# Altium PCB PCB-Powermodule-v11.0.0.PcbDoc (part 1 of 5)
Units mil, origin at the board's own origin, x right, y up, seen from the top; angles counter-clockwise.
Board outline 3031.5 x 1495.87 mil, 4 copper layers (Top Layer, Ground, Power, Bottom Layer), stack 61.653 mil thick; 227 components, 160 nets, 893 pads, 326 vias.
Unrouted connection lines stored in the file: 45.
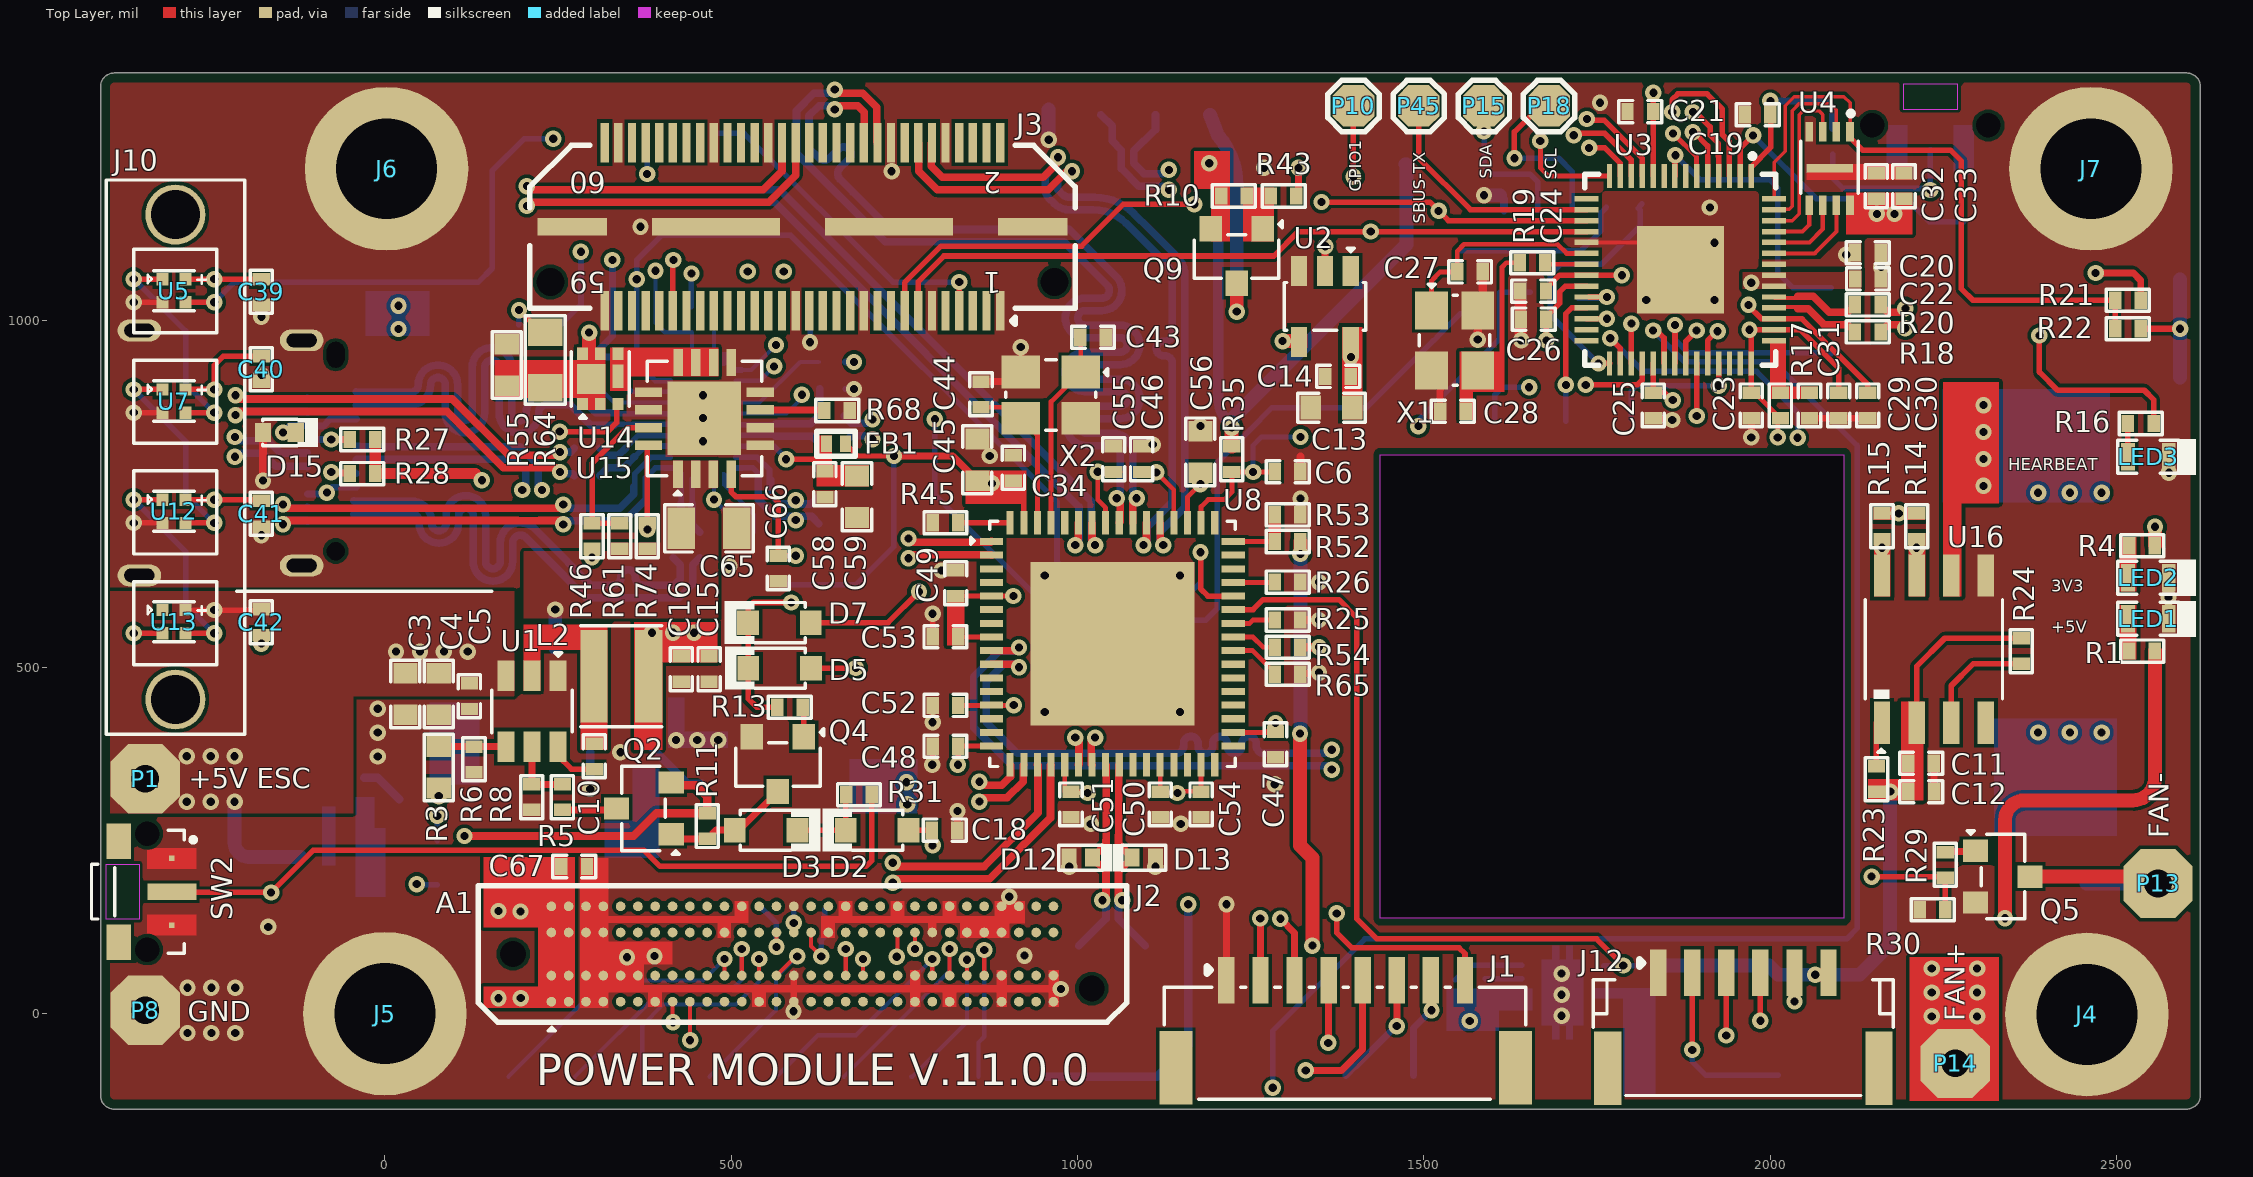
[diagram p0: Top Layer view]
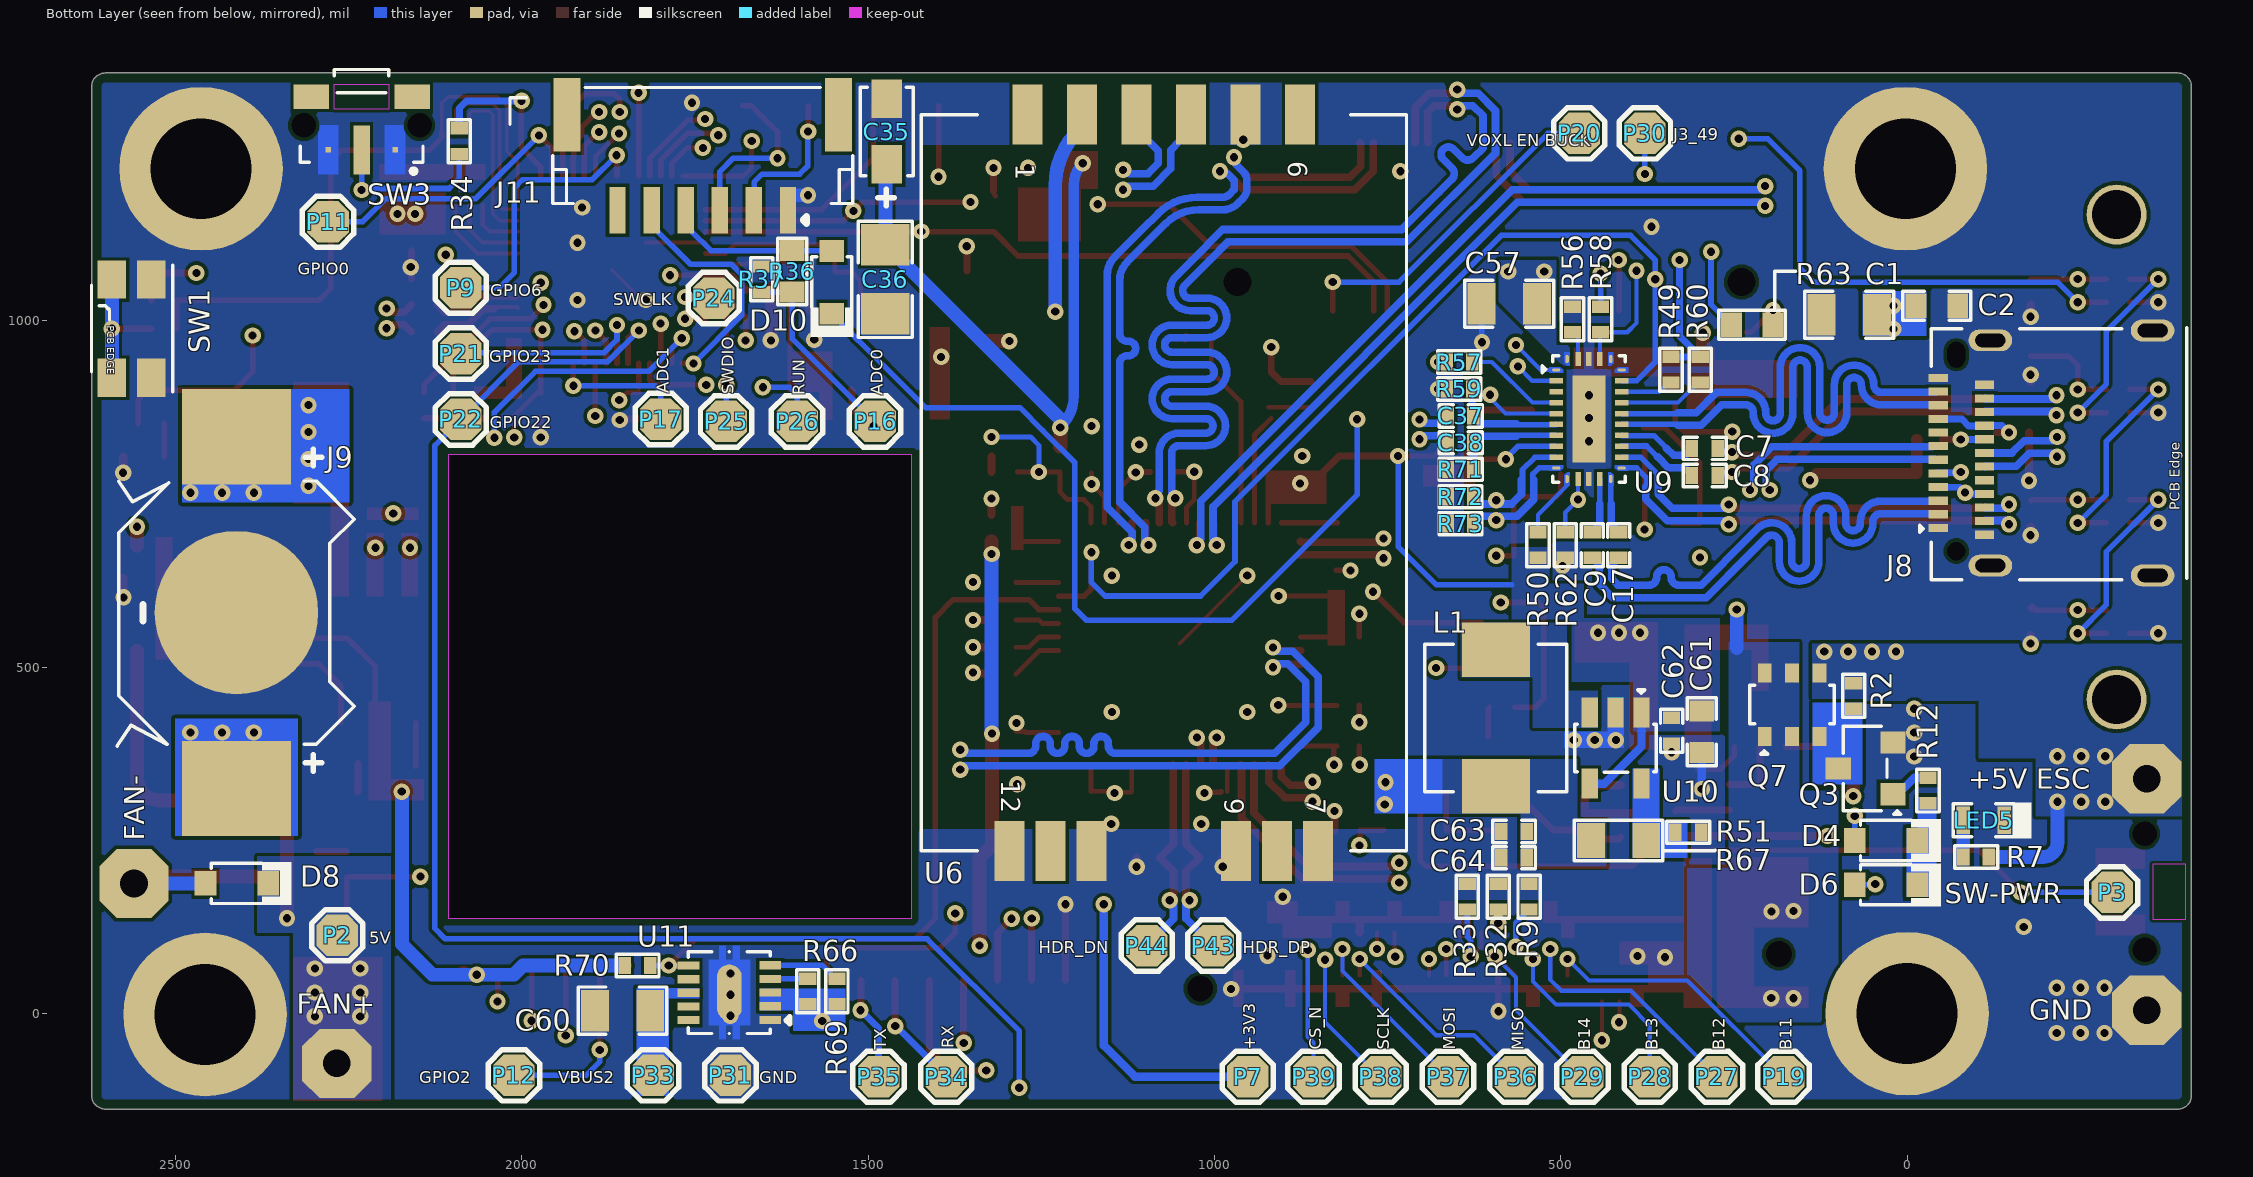
[diagram p1: Bottom Layer view, seen from below]
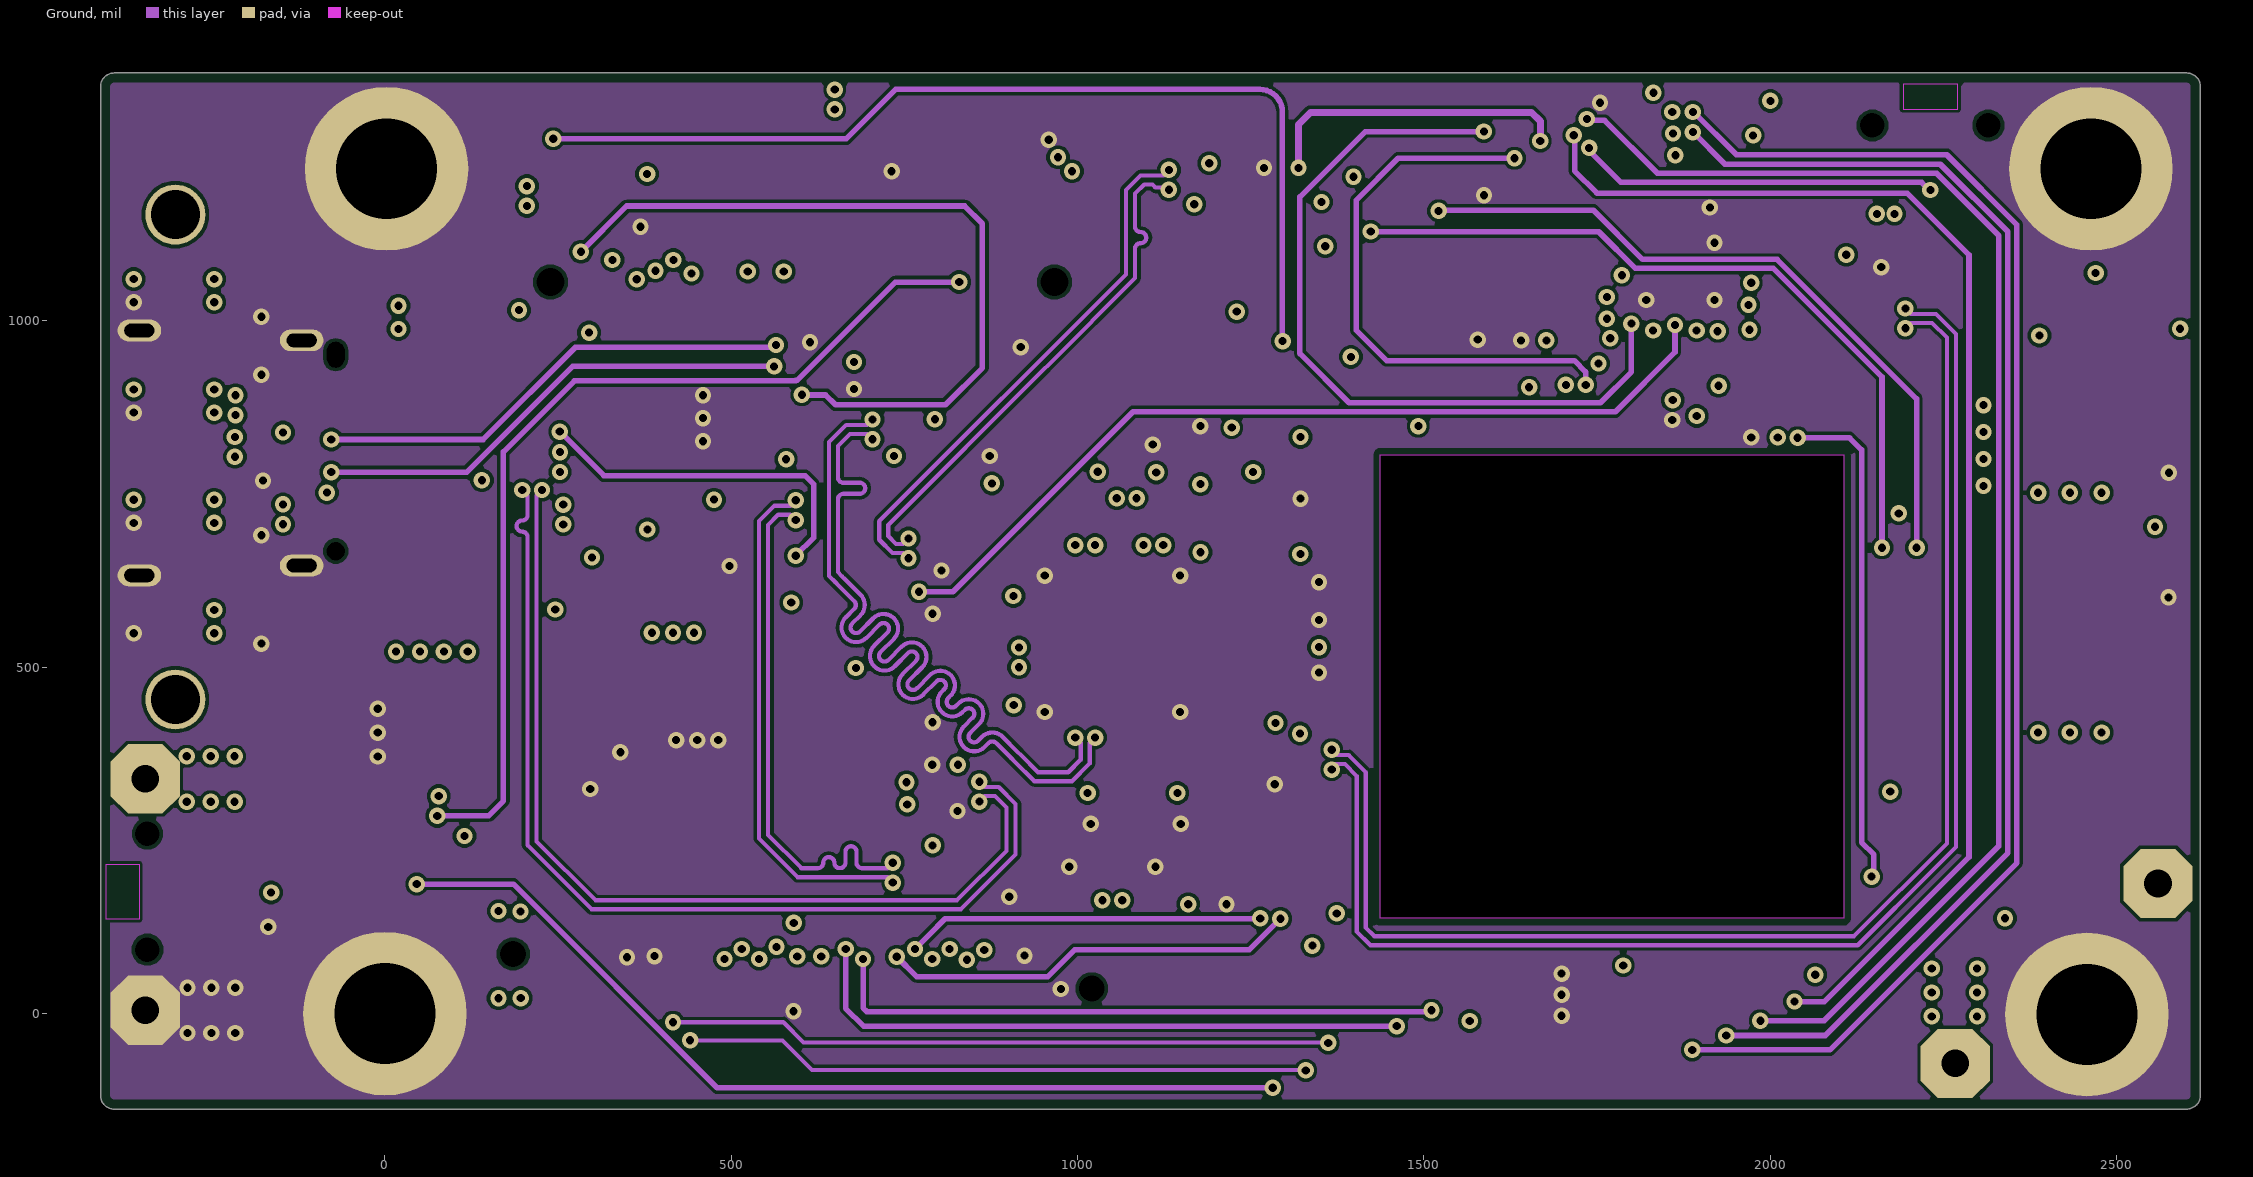
[diagram p2: Ground]
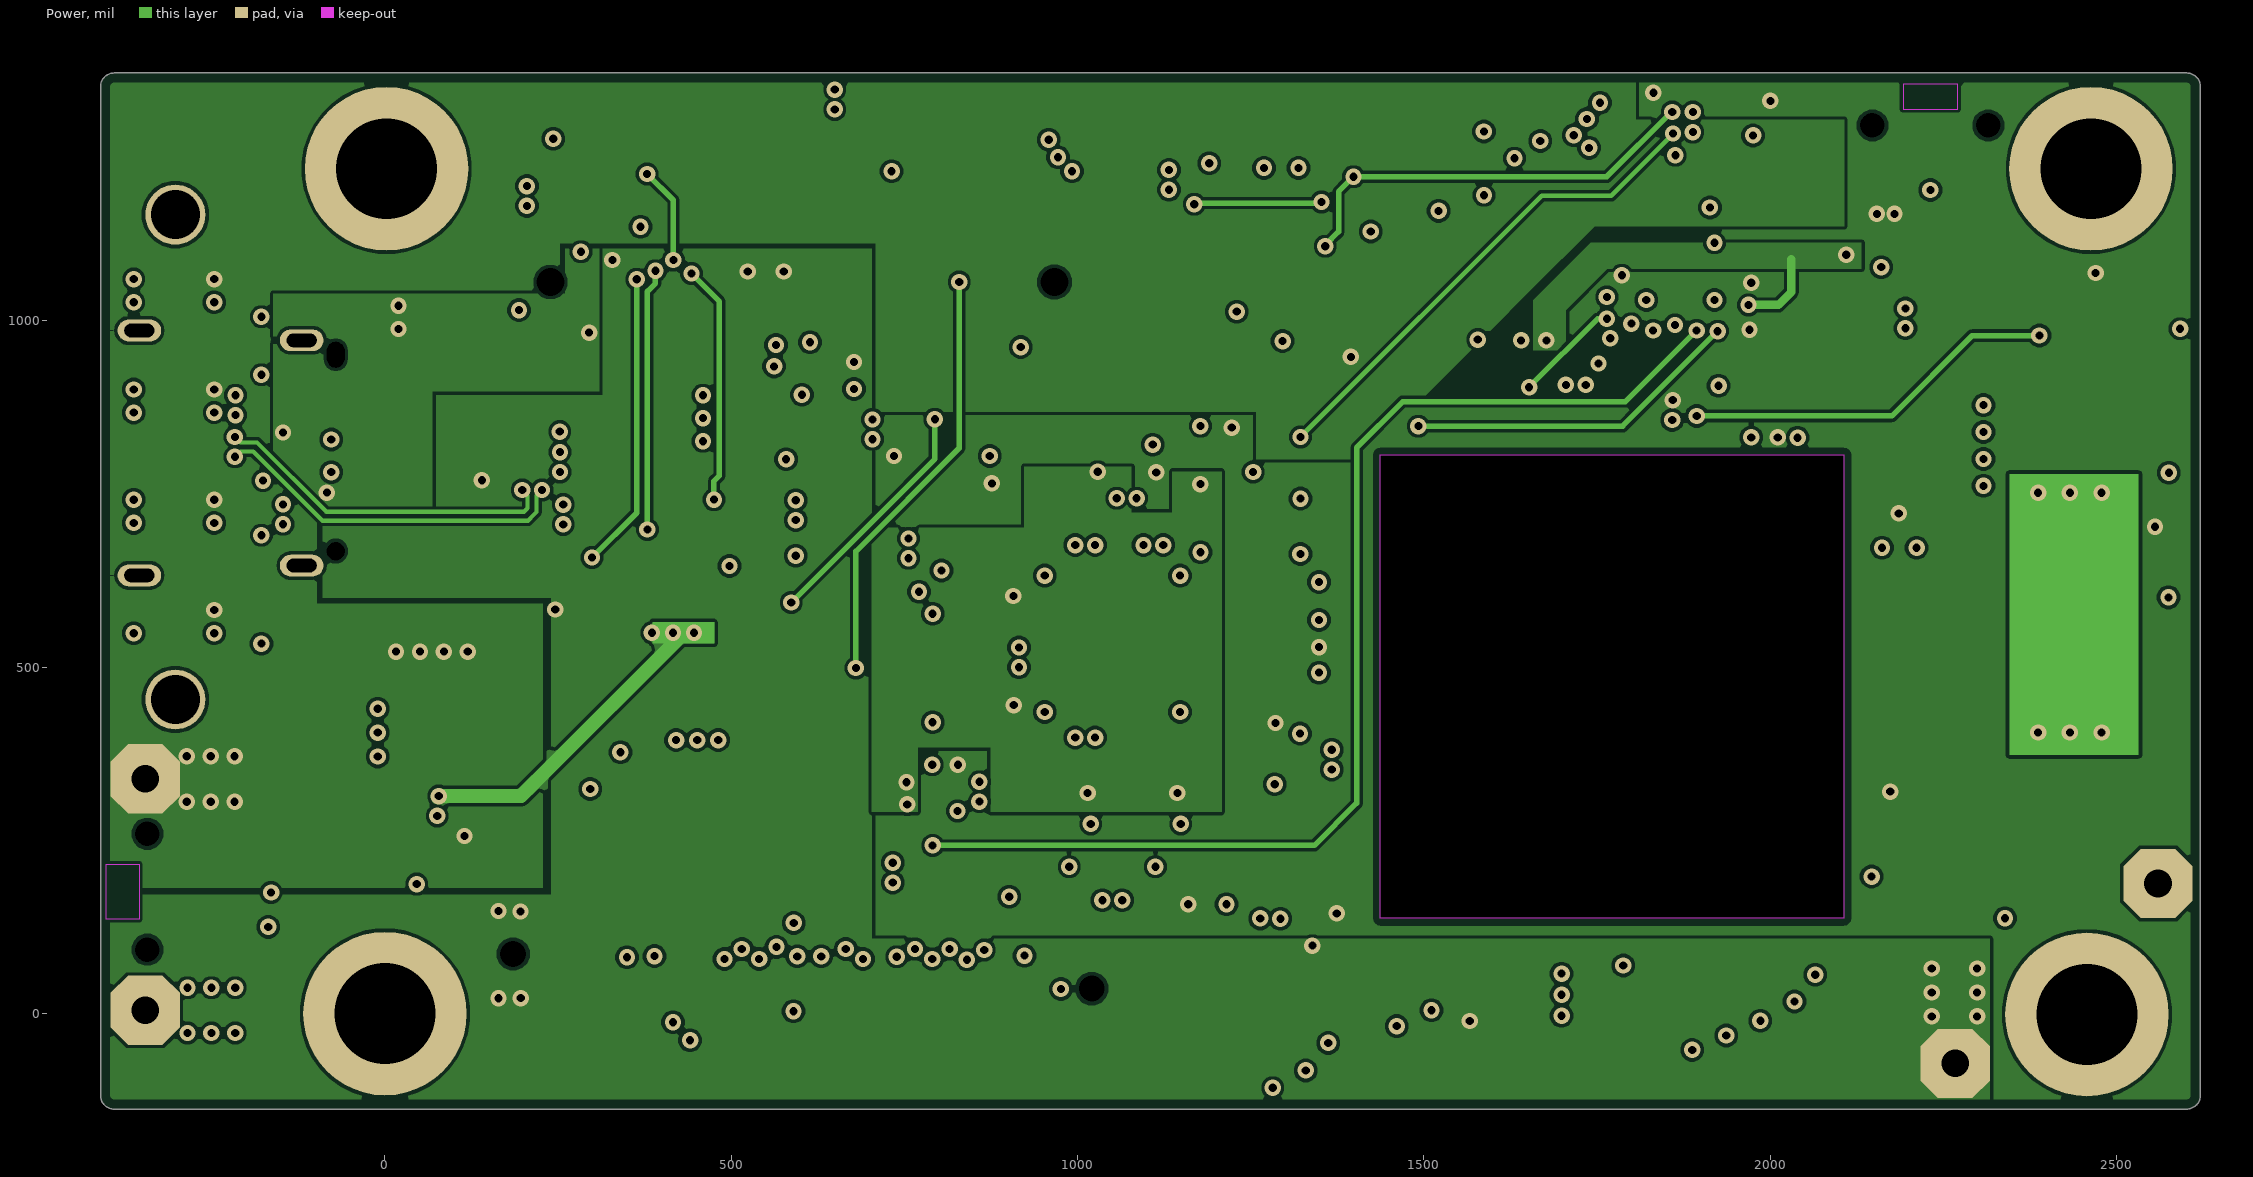
[diagram p3: Power]
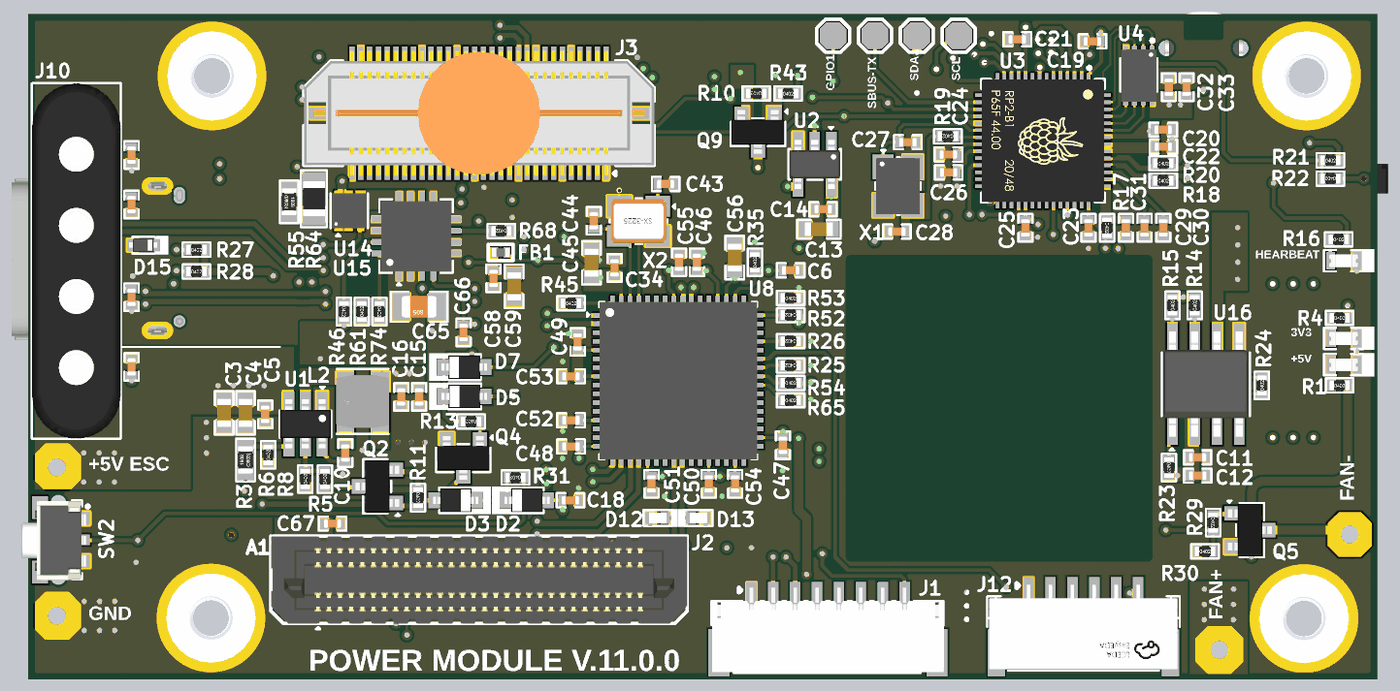
[diagram p6: 3D render of the assembled board from above, using the file's embedded part models]
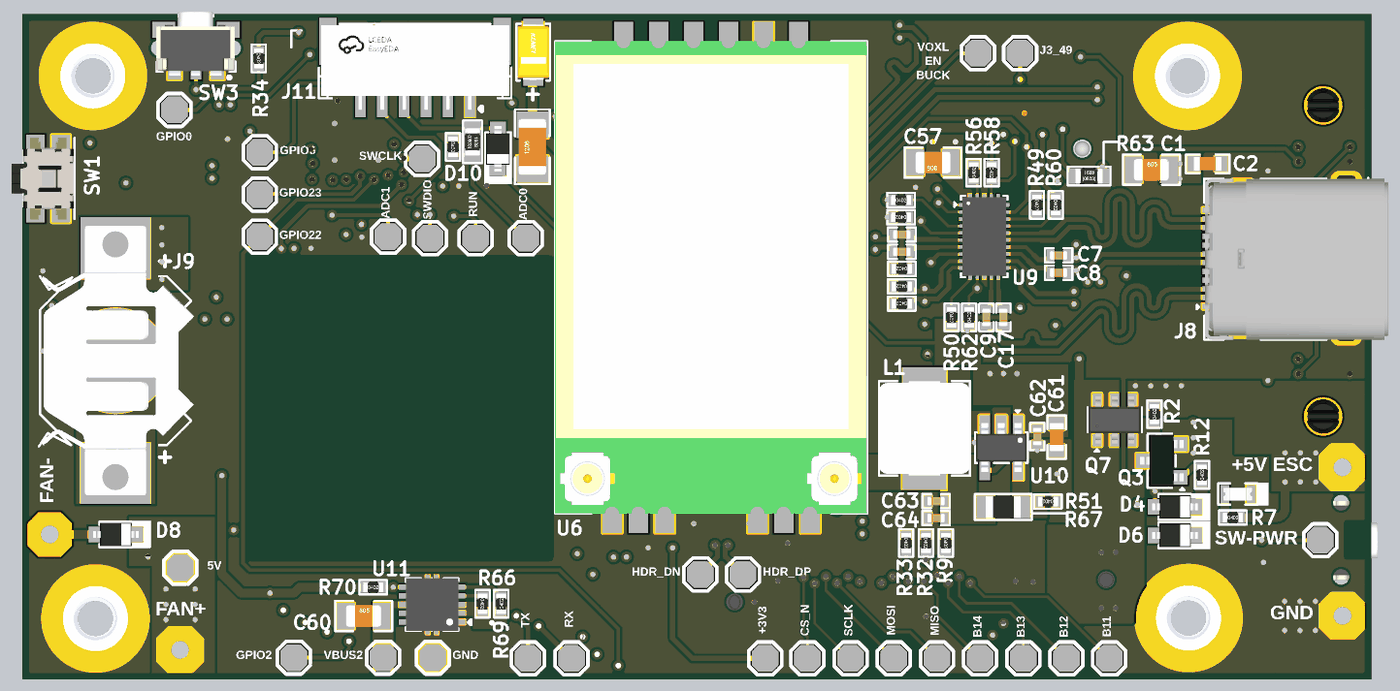
[diagram p7: 3D render of the assembled board from below, using the file's embedded part models]

## Layer stack, top to bottom
Top Solder: solder mask 0.787, SM-001, Dk 4
Top Layer: signal copper 1.378
Dielectric 1: prepreg 7.992, PP-017, Dk 4.3
Ground: signal copper 1.181
Dielectric 3: core 40.551, Core-039, Dk 4.8
Power: signal copper 1.181
Dielectric 5: prepreg 7.992, PP-017, Dk 4.3
Bottom Layer: signal copper 1.378
Bottom Solder: solder mask 0.787, SM-001, Dk 4

## Board outline
-410.5,-118.11 -410.5,1338.39 cw(c-390.81,1338.39) -390.81,1358.07 2601,1358.07 2601.32,1358.07 cw(c2601.32,1338.39) 2621,1338.39 2621,-118.31 2621,-118.11 cw(c2601.32,-118.11) 2601.32,-137.8 -390.81,-137.79 cw(c-390.81,-118.11)
cut-out: 1437.21,137.4 1437.21,806.69 2106.5,806.69 2106.5,137.4

## Design rules (kind name [scope] priority, off if disabled: settings)
BoardOutlineClearance [All] p1: gap=0 ignorepadtopadclearanceinfootprint=FALSE except(10: Poly-CavityEdge Poly-CutoutEdge Poly-SplitBarrior; 14: Poly-OutlineEdge)
Clearance [All] p1: gap=5 ignorepadtopadclearanceinfootprint=FALSE
DiffPairsRouting [InDifferentialPairClass('All Differential Pairs')] p1: maxlimit=7 minlimit=7 mostfreqgap=7 toplayer_minwidth=6 toplayer_maxwidth=11 toplayer_prefwidth=11 midlayer1_minwidth=6 midlayer1_maxwidth=6 midlayer1_prefwidth=6 midlayer2_minwidth=6 midlayer2_maxwidth=6 midlayer2_prefwidth=6 bottomlayer_minwidth=6 bottomlayer_maxwidth=11 bottomlayer_prefwidth=11 impedanceprofiledriven=TRUE impedanceprofileid={9FB91FCD-7C47-4A22-8230-657BD11F0473} impedanceprofilevalue=90.000000 maxuncoupledlength=500
Height [All] p1: minheight=0 maxheight=39370.08 prefheight=0
HoleSize [All] p1: absolutevalues=TRUE maxlimit=1000 minlimit=1 maxpercent=80.000 minpercent=20.000
HoleToHoleClearance [All] p1: gap=6 allowstackedmicrovias=TRUE
MatchedLengths "Schematic Matched Net Lengths_2" [InNetClass('VOXL_SS_USB')] p1: tolerance=20 checknetsindiffpair=TRUE checkdiffpairvsdiffpair=FALSE checkxsignals=FALSE checkothers=FALSE
MatchedLengths "Schematic Matched Net Lengths_1" [InNetClass('D_SS')] p2: tolerance=20 checknetsindiffpair=TRUE checkdiffpairvsdiffpair=FALSE checkxsignals=FALSE checkothers=FALSE
MatchedLengths "Schematic Matched Net Lengths" [InNetClass('VOXL_USB')] p3: tolerance=20 checknetsindiffpair=TRUE checkdiffpairvsdiffpair=FALSE checkxsignals=FALSE checkothers=FALSE
MatchedLengths "Schematic Matched Net Lengths_5" [InNetClass('D')] p4: tolerance=20 checknetsindiffpair=TRUE checkdiffpairvsdiffpair=FALSE checkxsignals=FALSE checkothers=FALSE
MatchedLengths "Schematic Matched Net Lengths_3" [InNetClass('USB_D')] p5: tolerance=20 checknetsindiffpair=TRUE checkdiffpairvsdiffpair=FALSE checkxsignals=FALSE checkothers=FALSE
MaxMinImpedance "Schematic Impedance Constraint_3" [InNetClass('VOXL_SS_USB')] p1: minimum=88.00 maximum=102.0
MaxMinImpedance "Schematic Impedance Constraint_2" [InNetClass('VOXL_USB')] p2: minimum=88.00 maximum=102.0
MaxMinImpedance "Schematic Impedance Constraint" [InNetClass('D_SS')] p3: minimum=88.00 maximum=102.0
MaxMinImpedance "Schematic Impedance Constraint_4" [InNetClass('D')] p4: minimum=88.00 maximum=102.0
MaxMinImpedance "Schematic Impedance Constraint_1" [InNetClass('USB_D')] p5: minimum=88.00 maximum=102.0
MinimumSolderMaskSliver [All] p1: minsoldermaskwidth=0
PolygonConnect [All] p1: connectstyle=Direct reliefconductorwidth=10 reliefentries=4 polygonreliefangle="90 Angle" airgapwidth=10
RoutingVias [All] p1: holewidth=11.81 width=23.62 viastyle="Through Hole" minholewidth=11.81 minwidth=23.62 maxholewidth=11.81 maxwidth=23.62
SilkToSilkClearance [All] p1: silktosilkclearance=0
SilkToSolderMaskClearance [IsPad] p1: minsilkscreentomaskgap=0 clearancetoexposedcopper=TRUE
SolderMaskExpansion SolderMaskExpansion_1 [IsVia] p1: expansion=4 istentingtop=TRUE
SolderMaskExpansion [All] p2: expansion=4 istentingtop=FALSE
SupplyNets "Schematic Supply Nets_6" [InNet('+1V1')] p1: voltage=0.000
SupplyNets "Schematic Supply Nets_5" [InNet('1V1')] p2: voltage=0.000
SupplyNets "Schematic Supply Nets_4" [InNet('GND')] p3: voltage=0.000
SupplyNets "Schematic Supply Nets_3" [InNet('+5V_ESC')] p4: voltage=0.000
SupplyNets "Schematic Supply Nets_2" [InNet('VOXL_EN_BUCK')] p5: voltage=0.000
SupplyNets "Schematic Supply Nets_1" [InNet('+5V')] p6: voltage=0.000
SupplyNets "Schematic Supply Nets" [InNet('+3V3')] p7: voltage=0.000
UnRoutedNet [All] p1: checkbadconnections=TRUE
Width [All] p1: maxlimit=100 minlimit=5 preferedwidth=5
22 further rules are at their usual default settings.

## Classes and differential pairs
differential pair class VOXL_USB_Lines: VOXL_USB
differential pair class D_SS_Lines: USB3_RX0 USB3_TX0
net class VOXL_USB: VOXL_USB_N VOXL_USB_P
net class D_SS: USB3_RX0_N USB3_RX0_P USB3_TX0_N USB3_TX0_P
differential pair class USB_LINES: USBC_D
differential pair class DP_LINES: CRX1 CRX2 CTX1 CTX1C CTX2 CTX2C USB3_RX0C
component class "USB HUB_Section": C1 C2 C6 C7 C8 C9 C17 C34 C37 C38 C43 C44 C45 C46 C47 C48 C49 C50 C51 C52 C53 C54 C55 C56 C57 C58 C59 C60 C61 C62 C63 C64 C65 C66 D12 D13 D15 FB1 J8 L1 P31 P33 P43 P44 R25 R26 R27 R28 R35 R45 R46 R49 R50 R51 R52 R53 R54 R55 R56 R57 R58 R59 R60 R61 R62 R63 R64 R65 R66 R67 R68 R69 R70 R71 R72 R73 R74 U8 U9 U10 U11 U14 U15 X2
component class RTC_Section: C11 C12 J9 R14 R15 R23 R24 U16
differential pair class VOXL_SS_USB_Lines: VOXL_USB_SSRX VOXL_USB_SSTX
differential pair class USB_WIFI_Lines: USB-WIFI
differential pair class USB_D_Lines: USB_D
differential pair class D_Lines: D USB-WIFI USB_HDR_D USBC_D
net class VOXL_SS_USB: VOXL_USB_SSRX_N VOXL_USB_SSRX_P VOXL_USB_SSTX_N VOXL_USB_SSTX_P
net class USB_D: USB_D_N USB_D_P
net class USB-WIFI: USB-WIFI_N USB-WIFI_P
net class D: D_N D_P USB-WIFI_N USB-WIFI_P USB_HDR_D_N USB_HDR_D_P USBC_D_N USBC_D_P
component class WiFiModule_Section: C35 C36 Q9 R10 R43 U6
component class Power_Section: C3 C4 C5 C10 C13 C14 C15 C16 C18 C39 C40 C41 C42 D2 D3 D4 D5 D6 D7 D8 D10 J10 L2 LED1 LED2 LED5 P1 P2 P3 P7 P8 P13 P14 P20 P21 P22 Q2 Q3 Q4 Q5 Q7 R1 R2 R3 R4 R5 R6 R7 R8 R11 R12 R13 R29 R30 R31 R34 R36 R37 SW2 SW3 U1 U2 U5 U7 U12 U13
component class FlashMemory_Section: C32 C33 R21 R22 SW1 U4
component class Controller_Section: C19 C20 C21 C22 C23 C24 C25 C26 C27 C28 C29 C30 C31 LED3 P9 P10 P11 P12 P15 P16 P17 P18 P24 P25 P26 R16 R17 R18 R19 R20 U3 X1
component class Connector_Section: C67 J1 J2 J3 J4 J5 J6 J7 J11 J12 P19 P27 P28 P29 P30 P34 P35 P36 P37 P38 P39 P45 R9 R32 R33
differential pair USB_HDR_D: +USB_HDR_D_P -USB_HDR_D_N
differential pair USB3_RX0C: +USB3_RX0C_P -USB3_RX0C_N
differential pair CTX2C: +CTX2C_P -CTX2C_N
differential pair CTX1C: +CTX1C_P -CTX1C_N
differential pair VOXL_USB_SSTX: +VOXL_USB_SSTX_P -VOXL_USB_SSTX_N
differential pair VOXL_USB_SSRX: +VOXL_USB_SSRX_P -VOXL_USB_SSRX_N
differential pair USBC_D: +USBC_D_P -USBC_D_N
differential pair USB3_TX0: +USB3_TX0_P -USB3_TX0_N
differential pair USB3_RX0: +USB3_RX0_P -USB3_RX0_N
differential pair CTX2: +CTX2_P -CTX2_N
differential pair CTX1: +CTX1_P -CTX1_N
differential pair CRX2: +CRX2_P -CRX2_N
differential pair CRX1: +CRX1_P -CRX1_N
differential pair VOXL_USB: +VOXL_USB_P -VOXL_USB_N
differential pair USB_D: +USB_D_P -USB_D_N
differential pair USB-WIFI: +USB-WIFI_P -USB-WIFI_N
differential pair D: +D_P -D_N

## Components (designator, comment, footprint, x,y, rotation, side; value= is the part's Value field where it differs from the comment)
C1 "47uF" Cap-0805 83.54,1009 r180 bottom
C2 "10uF" Cap-0603 -43,1022 r180 bottom
C3 "10uF" Cap-0603 29.58,461.48 r90 top
C4 "10uF" Cap-0603 77.66,461.48 r90 top
C5 "100nF" cap-0402 122.03,458.32 r90 top
C6 "1uF" Cap-0402 1303.19,782.48 r180 top
C7 "470nF" Cap-0402 292.06,816.03 r180 bottom
C8 "470nF" Cap-0402 292.06,776.98 r180 bottom
C9 "470nF" Cap-0402 454.48,676.51 r90 bottom
C10 "100nF" cap-0402 302.02,371.41 r270 top
C11 "1uF" Cap-0402 2217.89,361.46 r180 top
C12 "100nF" cap-0402 2218.01,320.46 r180 top
C13 "10uF" Cap-0603 1366.6,874.98 r0 top
C14 "100nF" cap-0402 1376.1,920 r0 top
C15 "22uF" Cap-0402 468,497.5 r90 top
C16 "22uF" Cap-0402 428,497.5 r90 top
C17 "470nF" Cap-0402 416.48,676.51 r90 bottom
C18 "100nF" cap-0402 808.1,265 r0 top
C19 "100nF" cap-0402 1981.77,1297.76 r0 top
C20 "100nF" cap-0402 2140.83,1098.73 r0 top
C21 "100nF" cap-0402 1812.46,1302.33 r0 top
C22 "100nF" cap-0402 2141.15,1060.74 r0 top
C23 "100nF" cap-0402 1972.7,878.05 r270 top
C24 "100nF" cap-0402 1657.82,1043.18 r0 top
C25 "100nF" cap-0402 1830.96,878.05 r270 top
C26 "100nF" cap-0402 1658.33,1002.74 r0 top
C27 "10pF" Cap-0402 1566.61,1070.88 r0 top
C28 "10pF" Cap-0402 1541.92,869.7 r180 top
C29 "2.2uF" Cap-0402 2140.83,878.05 r90 top
C30 "2.2uF" Cap-0402 2098.8,878.05 r90 top
C31 "2.2uF" Cap-0402 2056.76,878.05 r90 top
C32 "2.2uF" Cap-0402 2193.09,1194.71 r270 top
C33 "100nF" cap-0402 2153.28,1194.71 r270 top
C34 "10uF" Cap-0603 855.38,799.48 r90 top
C35 "100uF" Case-A 1473.1,1273.5 r90 bottom
C36 "100uF" Cap-1206 1475.05,1060.2 r90 bottom
C37 "470nF" Cap-0402 644.56,862.89 r180 bottom
C38 "470nF" Cap-0402 644.56,824.22 r180 bottom
C39 "100nF" Cap-0402 -178.35,1041.94 r270 top
C40 "100nF" Cap-0402 -178.35,930.5 r270 top
C41 "100nF" Cap-0402 -178.35,721.79 r270 top
C42 "100nF" Cap-0402 -178.35,565.18 r270 top
C43 "18pF" Cap-0402 1022.29,976.7 r180 top
C44 "18pF" Cap-0402 860.63,894.01 r270 top
C45 "0.01uF" Cap-0402 907.38,787.98 r90 top
C46 "0.01uF" Cap-0402 1092.43,800.48 r90 top
C47 "0.01uF" Cap-0402 1285.71,388.68 r270 top
C48 "0.01uF" Cap-0402 809.29,386.05 r180 top
C49 "0.01uF" Cap-0402 824.29,621.38 r270 top
C50 "0.01uF" Cap-0402 1119.28,301.98 r90 top
C51 "0.01uF" Cap-0402 990.48,301.98 r90 top
C52 "0.01uF" Cap-0402 809.29,444.98 r0 top
C53 "0.01uF" Cap-0402 809.29,544.05 r0 top
C54 "0.01uF" Cap-0402 1178.33,301.98 r90 top
C55 "0.01uF" Cap-0402 1052.34,800.48 r270 top
C56 "10uF" Cap-0603 1177.37,810.98 r270 top
C57 "47uF" Cap-0805 574.3,1024.94 r0 bottom
C58 "100nF" cap-0402 635.24,764.34 r90 top
C59 "10uF" Cap-0603 681.56,746.34 r90 top
C60 "47uF" Cap-0805 1854.43,4.49 r180 bottom
C61 "10uF" Cap-0603 296.35,407 r270 bottom
C62 "100nF" cap-0402 340,408.5 r90 bottom
C63 "22uF" Cap-0402 567.5,263 r180 bottom
C64 "22uF" Cap-0402 567.5,225 r180 bottom
C65 "47uF" Cap-0805 467.98,700.51 r180 top
C66 "47nF" Cap-0402 567.82,642.68 r90 top
C67 "22uF" Cap-0402 273.27,212.5 r0 top
D2 "1N4148WS" SOD-323 710.56,264.86 r0 top
D3 "1N4148WS" SOD-323 550.23,264.86 r180 top
D4 "1N4148WS" SOD-323 30.28,250 r0 bottom
D5 "1N4148WS" SOD-323 569.76,498.74 r0 top
D6 "1N4148WS" SOD-323 30.28,186 r0 bottom
D7 "1N4148WS" SOD-323 569.61,564.57 r0 top
D8 "1N4148WS" SOD-323 2411.31,188 r0 bottom
D10 "1N4148WS" SOD-323 1552.33,1055.66 r90 bottom
D12 "ESD5341N-2/TR" DFN1006-2L_ 1004.61,225.17 r180 top
D13 "ESD5341N-2/TR" DFN1006-2L_ 1095.6,225.17 r0 top
D15 "ESD5Z6.0T1G" SOD-523 -152.33,839.09 r0 top
FB1 "HPZ1005D221R50TF" IND-0402 651.34,822.7 r180 top
J1 "SM08B-GHS-TB(LF)(SN)" SM08B-GHS-TB(LF)(SN) 1387.1,-15.02 r0 top
J2 "ADM6-30-01.5-L-4-2-A-TR" ADM6-30-01.5-L-4-2-A-TR 602.78,86.09 r180 top locked
J3 "QTH-030-01-L-D-A-K-TR" QTH-030-01-L-D-A-K-TR 602.78,1136.09 r180 top locked
J4 "9774050151R" Spacer 2457.18,-1.21 r180 top locked
J5 "9774050151R" Spacer 0,0 r180 top locked
J6 "9774050151R" Spacer 2.38,1219.82 r180 top locked
J7 "9774050151R" Spacer 2463.02,1219.82 r180 top
J8 "12401832E402A" 12401832E402A -199.73,809.5 r90 bottom
J9 "MY-927-02" MY-927-02 2412,579 r270 bottom
J10 "LPAV3-160-1000D-1-4" LPAV3-160-1000D-1-4 -302.53,803.55 r270 top
J11 "SM06B-GHS-TB(LF)(SN)" SM06B-GHS-TB(LF)(SN) 1738.72,1228.69 r0 bottom
J12 "SM06B-GHS-TB(LF)(SN)" SM06B-GHS-TB(LF)(SN) 1961.18,-9.94 r0 top locked
L1 "2.2uH" YSPI0520-2R2M_ 593.73,426.8 r270 bottom
L2 "3.3uH" VLS3012HBX-3R3M 341.39,487.2 r0 top
LED1 "Emerald" LED-0603 2546,570 r0 top
LED2 "Emerald" LED-0603 2546.01,629.32 r0 top
LED3 "Emerald" LED-0603 2546.01,803.95 r0 top
LED5 "DNP" LED-0603 -110.66,279.07 r180 bottom
P1 "Wirepad 2.54/1.0" "Wirepad 2.54/1.0" -346,339 r90 top
P2 "TEST POINT" Test-point 2266.42,113.08 r0 bottom
P3 "TEST POINT" Test-point -296,175 r0 bottom
P7 "TEST POINT" Test-point 951.85,-91 r180 bottom
P8 "Wirepad 2.54/1.0" "Wirepad 2.54/1.0" -346,5 r90 top
P9 "TEST POINT" Test-point 2088.01,1048.12 r270 bottom
P10 "TEST POINT" Test-point 1398.35,1310.5 r180 top
P11 "TEST POINT" Test-point 2279.74,1143.26 r270 bottom
P12 "TEST POINT" Test-point 2011.34,-89.09 r0 bottom
P13 "Wirepad 2.54/1.0" "Wirepad 2.54/1.0" 2560,188 r0 top
P14 "Wirepad 2.54/1.0" "Wirepad 2.54/1.0" 2267,-71.81 r90 top
P15 "TEST POINT" Test-point 1586.64,1310.5 r180 top
P16 "TEST POINT" Test-point 1490.05,855 r270 bottom
P17 "TEST POINT" Test-point 1799.47,858.41 r90 bottom
P18 "TEST POINT" Test-point 1680.78,1310.5 r0 top
P19 "TEST POINT" Test-point 178.35,-91 r90 bottom
P20 "TEST POINT" Test-point 473.35,1270.88 r0 bottom
P21 "TEST POINT" Test-point 2088.01,952.98 r0 bottom
P22 "TEST POINT" Test-point 2088.01,857.84 r90 bottom
P24 "TEST POINT" Test-point 1722.75,1033.15 r180 bottom
P25 "TEST POINT" Test-point 1705,855 r270 bottom
P26 "TEST POINT" Test-point 1602.58,855 r180 bottom
P27 "TEST POINT" Test-point 274.52,-91 r90 bottom
P28 "TEST POINT" Test-point 371.62,-91 r90 bottom
P29 "TEST POINT" Test-point 468.66,-91 r90 bottom
P30 "TEST POINT" Test-point 378.57,1270.88 r0 bottom
P31 "TEST POINT" Test-point 1698.8,-89.09 r270 bottom
P33 "TEST POINT" Test-point 1810.43,-89.09 r270 bottom
P34 "TEST POINT" Test-point 1387.18,-91 r180 bottom
P35 "TEST POINT" Test-point 1484.96,-91 r0 bottom
P36 "TEST POINT" Test-point 565.71,-91 r90 bottom
P37 "TEST POINT" Test-point 662.75,-91 r90 bottom
P38 "TEST POINT" Test-point 759.8,-91 r0 bottom
P39 "TEST POINT" Test-point 856.85,-91 r0 bottom
P43 "TEST POINT" Test-point 1001.85,98.27 r270 bottom
P44 "TEST POINT" Test-point 1097.62,98.27 r270 bottom
P45 "TEST POINT" Test-point 1492.49,1310.5 r270 top
Q2 "SI2301CDS" SOT-23 373.98,296.26 r90 top
Q3 "BC817 6B 160-400" SOT-23 60,354 r90 bottom
Q4 "BC817 6B 160-400" SOT-23 567.23,360.37 r180 top
Q5 "2N7002KT1G" SOT-23 2335.53,197.9 r270 top
Q7 "IRLTS2242TRPBF" 6-TSOP_ 166.02,445.81 r90 bottom value=55MR
Q9 "SI2301CDS" Sot-23 1229.79,1093.84 r180 top
R1 "560R" Res-0402 2536.99,523.46 r0 top
R2 "100K" Res-0402 76.86,458.8 r90 bottom
R3 "33.2K" Res-0603 77.66,355.58 r270 top
R4 "200R" Res-0402 2536.99,675.45 r0 top
R5 "10K" Res-0402 256.27,312.58 r90 top
R6 "10K" Res-0402 128.67,367.08 r90 top
R7 "DNP" Res-0402 -99.63,226.24 r180 bottom value=390R
R8 "100K" Res-0402 212.07,312.58 r90 top
R9 "1K" Res-0402 545.76,168.86 r270 bottom
R10 "10K" Res-0402 1225.63,1180.37 r180 top
R11 "100K" Res-0402 465.44,270.87 r270 top
R12 "100K" Res-0402 -30.23,322.1 r90 bottom
R13 "100K" Res-0402 584.67,442.44 r180 top
R14 "4.7K" Res-0402 2211.39,703.71 r90 top
R15 "4.7K" Res-0402 2161.39,703.71 r90 top
R16 "200R" Res-0402 2534.98,852 r0 top
R17 "200R" Res-0402 2014.73,878.05 r270 top
R18 "27R" Res-0402 2140.83,984.24 r0 top
R19 "1K" Res-0402 1656.66,1084.02 r180 top
R20 "27R" Res-0402 2140.83,1023.24 r0 top
R21 "10K" Res-0402 2516.48,1030 r0 top
R22 "1K" Res-0402 2516.48,988.83 r180 top
R23 "DNP" Res-0402 2153.39,338.6 r270 top
R24 "DNP" Res-0402 2362.23,523.46 r90 top
R25 "10K" Res-0402 1303.19,568.26 r180 top
R26 "10K" Res-0402 1303.19,623.05 r180 top
R27 "DNP" Res-0402 -32.47,828.92 r0 top value=56kR
R28 "DNP" Res-0402 -32.47,779.7 r0 top value=56kR
R29 "100K" Res-0402 2252.92,214.83 r270 top
R30 "100K" Res-0402 2234.42,150.08 r0 top
R31 "1K" Res-0402 684.43,316.17 r180 top
R32 "1K" Res-0402 590.28,168.86 r270 bottom
R33 "1K" Res-0402 634.81,168.86 r270 bottom
R34 "100K" Res-0402 2090.08,1259.48 r270 bottom
R35 "10K" Res-0402 1222.79,800.48 r90 top
R36 "20K" Res-0603 1609.66,1071.7 r90 bottom
R37 "10K" Res-0402 1653.6,1060.2 r270 bottom
R43 "100R" Res-0402 1297.55,1180.37 r0 top
R45 "9.1K" Res-0402 809.29,708.58 r0 top value=9.1kR
R46 "200K" Res-0402 378.93,689.51 r270 top value=200kR
R49 "200K" Res-0402 340.91,929.72 r270 bottom value=200kR
R50 "200K" Res-0402 532.8,676.51 r270 bottom value=200kR
R51 "150K" Res-0402 316,262 r0 bottom
R52 "90.9K" Res-0402 1303.19,681.62 r180 top value=90.9kR
R53 "10K" Res-0402 1303.19,720.05 r0 top
R54 "10K" Res-0402 1303.19,529.05 r0 top
R55 "1M" Res-0603 175.85,936.56 r90 top
R56 "0R" Res-0402 483.05,1002.31 r90 bottom
R57 "4.7K" Res-0402 646.3,940.75 r180 bottom
R58 "0R" Res-0402 442.55,1002.31 r270 bottom
R59 "100K" Res-0402 646.3,901.85 r0 bottom
R60 "DNP" Res-0402 298.56,929.72 r270 bottom
R61 "10K" Res-0402 339,689.51 r90 top
R62 "DNP" Res-0402 493.48,676.51 r90 bottom
R63 "500K" Res-0603 223.61,994.56 r0 bottom
R64 "400K" RES-0805 231.52,943.56 r90 top
R65 "10K" Res-0402 1303.19,490.05 r0 top
R66 "10K" Res-0402 1587.04,32.17 r270 bottom
R67 "125K" RES-0805 416.46,249.91 r0 bottom
R68 "200K" Res-0402 652.9,870.86 r180 top value=200kR
R69 "10K" Res-0402 1545.04,32.17 r90 bottom
R70 "10K" Res-0402 1832.93,69.45 r180 bottom
R71 "100K" Res-0402 644.56,785.7 r0 bottom
R72 "100K" Res-0402 644.74,746.22 r0 bottom
R73 "100K" Res-0402 644.74,707.48 r0 bottom
R74 "0R" Res-0402 299.07,689.51 r270 top
SW1 "DNP" EVQ-P7J01P 2563.25,988.83 r270 bottom
SW2 "TL3340AF160QG" TL3340AF160QG -345.87,176 r270 top
SW3 "TL3340AF160QG" TL3340AF160QG 2231.22,1285.36 r0 bottom
U1 "TPS563201DDCR" "SOT-23-6 THIN" 212.43,436.79 r270 top
U2 "SN74LV1T34DBVR" SOT-23-5 1357.19,1021 r270 top
U3 "RP2040TR7" "QFN-56 (7x7)" 1870.33,1074.05 r270 top
U4 "W25Q16JVUXIQ TR" "8-USON (2x3)" 2115.28,1273.48 r270 top
U5 "XL-1010RGBC-WS2812B" XL-1010RGBC-WS2812B -304.53,1043.7 r0 top
U6 "BL-R8812AF1" BL-R8812AF1 1073.09,766.37 r270 bottom locked
U7 "XL-1010RGBC-WS2812B" XL-1010RGBC-WS2812B -304.53,884.45 r0 top
U8 "TUSB8041RGCR" "64-VQFN (9x9)" 1050.38,533.98 r0 top
U9 "HD3SS3220IRNHR" WQFN-30-EP(2.5x4.5) 459.3,858.54 r180 bottom
U10 "TLV62569DBVR" SOT-23-5 420.89,383.3 r270 bottom
U11 "TPS2003CDRCR" VSON-10-EP(3x3) 1700.34,30.24 r0 bottom
U12 "XL-1010RGBC-WS2812B" XL-1010RGBC-WS2812B -304.53,725.2 r0 top
U13 "XL-1010RGBC-WS2812B" XL-1010RGBC-WS2812B -304.53,565.94 r0 top
U14 "CSD17313Q2" CSD17313Q2 310.94,916.44 r90 top
U15 "TPS25910RSAT" "16-QFN (4x4)" 461.15,859.39 r90 top
U16 "DS3231MZ+TRL" "SOIC-8(0.154\", 3.90mm Width)" 2236.39,526.38 r90 top
X1 "12MHz" MCSJK-7U-12.00-10-10-80-B-10 1544.42,972.06 r270 top
X2 "E3SB24E000009E" SMD3225-4P 961.29,893.05 r180 top

## Footprints (in the part's own frame and the unit in brackets; to place one, negate y for a bottom-side part, rotate by r counter-clockwise, add the part's x,y. Pads: shape width x height; smd on the part's side, far side on the other; paste and mask are expansions set on the pad)
6-TSOP_ [mil]
  rect 27.52x20 smd: 1(-45.77,39.41) 2(-45.77,0) 3(-45.77,-39.41) 4(45.77,-39.41) 5(45.77,0) 6(45.77,39.41)
  silkscreen extent -71,-61 28,61, body extent -53,-59 53,59, height 39
"8-USON (2x3)" [mm]
  rect 0.711x0.28 smd: 1(0,0) 2(0,-0.5) 3(0,-1) 4(0,-1.5) 5(2.695,-1.5) 6(2.695,-1) 7(2.695,-0.5) 8(2.695,0)
  rect 0.3x1.7 smd: 9(1.348,-0.75)
  silkscreen extent -0.72,-1.8 2.26,0.3, body extent -0.15,-1.75 2.85,0.25, height 0.6
"16-QFN (4x4)" [mm]
  rect 1x0.35 smd paste-100 mask+0.051: 1(-2.05,0.965) 2(-2.05,0.315) 3(-2.05,-0.335) 4(-2.05,-0.986) 9(2.05,-0.991) 10(2.05,-0.34) 11(2.05,0.31) 12(2.05,0.96)
  rect 0.35x1 smd paste-100 mask+0.051: 5(-0.991,-2.05) 6(-0.34,-2.05) 7(0.31,-2.05) 8(0.96,-2.05) 13(0.96,2.05) 14(0.31,2.05) 15(-0.34,2.05) 16(-0.991,2.05)
  rect 2.7x2.7 smd paste-100 mask+0.051: 17(0,0)
  silkscreen extent -2.8,-2.1 2.1,2.1, body extent -2,-2 2,2, height 1
"64-VQFN (9x9)" [mm]
  rect 0.86x0.26 smd: 1(-4.435,3.75) 2(-4.435,3.25) 3(-4.435,2.75) 4(-4.435,2.25) 5(-4.435,1.75) 6(-4.435,1.25) 7(-4.435,0.75) 8(-4.435,0.25) 9(-4.435,-0.25) 10(-4.435,-0.75) 11(-4.435,-1.25) 12(-4.435,-1.75) 13(-4.435,-2.25) 14(-4.435,-2.75) 15(-4.435,-3.25) 16(-4.435,-3.75) 33(4.435,-3.75) 34(4.435,-3.25) 35(4.435,-2.75) 36(4.435,-2.25) 37(4.435,-1.75) 38(4.435,-1.25) 39(4.435,-0.75) 40(4.435,-0.25) 41(4.435,0.25) 42(4.435,0.75) 43(4.435,1.25) 44(4.435,1.75) 45(4.435,2.25) 46(4.435,2.75) 47(4.435,3.25) 48(4.435,3.75)
  rect 0.26x0.86 smd: 17(-3.75,-4.435) 18(-3.25,-4.435) 19(-2.75,-4.435) 20(-2.25,-4.435) 21(-1.75,-4.435) 22(-1.25,-4.435) 23(-0.75,-4.435) 24(-0.25,-4.435) 25(0.25,-4.435) 26(0.75,-4.435) 27(1.25,-4.435) 28(1.75,-4.435) 29(2.25,-4.435) 30(2.75,-4.435) 31(3.25,-4.435) 32(3.75,-4.435) 49(3.75,4.435) 50(3.25,4.435) 51(2.75,4.435) 52(2.25,4.435) 53(1.75,4.435) 54(1.25,4.435) 55(0.75,4.435) 56(0.25,4.435) 57(-0.25,4.435) 58(-0.75,4.435) 59(-1.25,4.435) 60(-1.75,4.435) 61(-2.25,4.435) 62(-2.75,4.435) 63(-3.25,4.435) 64(-3.75,4.435)
  rect 6x6 smd paste-4: 65(0,0)
  silkscreen extent -5.2,-4.5 4.5,4.5, body extent -4.5,-4.5 4.5,4.5, height 1
12401832E402A [mm]
  oval 0.8x1.6 hole 0.5 slot 1.1 at 90 deg: 1(-4.13,2.02) 2(-4.49,-3.93) 3(4.49,-3.93) 4(4.13,2.02)
  rect 0.3x0.7 smd: A1(-2.75,3.93) A2(-2.25,3.93) A3(-1.75,3.93) A4(-1.25,3.93) A5(-0.75,3.93) A6(-0.25,3.93) A7(0.25,3.93) A8(0.75,3.93) A9(1.25,3.93) A10(1.75,3.93) A11(2.25,3.93) A12(2.75,3.93) B1(2.5,2.23) B2(2,2.23) B3(1.5,2.23) B4(1,2.23) B5(0.5,2.23) B6(0,2.23) B7(-0.5,2.23) B8(-1,2.23) B9(-1.5,2.23) B10(-2,2.23) B11(-2.5,2.23) B12(-3,2.23)
  round 0 hole 0.675 unplated: ""(-3.6,3.27)
  round 0 hole 0.65 slot 0.95 at 0 deg unplated: ""(3.6,3.27)
  silkscreen extent -4.65,-5.18 4.6,4.61, body extent -4.65,-6.31 4.55,4.18, height 3.3
ADM6-30-01.5-L-4-2-A-TR [mm]
  round 0.356 smd: A01(9.207,1.75) A02(8.572,1.75) A03(7.938,1.75) A04(7.302,1.75) A05(6.667,1.75) A06(6.032,1.75) A07(5.397,1.75) A08(4.763,1.75) A09(4.127,1.75) A10(3.492,1.75) A11(2.857,1.75) A12(2.222,1.75) A13(1.587,1.75) A14(0.952,1.75) A15(0.317,1.75) A16(-0.318,1.75) A17(-0.953,1.75) A18(-1.588,1.75) A19(-2.223,1.75) A20(-2.858,1.75) A21(-3.492,1.75) A22(-4.127,1.75) A23(-4.763,1.75) A24(-5.397,1.75) A25(-6.032,1.75) A26(-6.667,1.75) A27(-7.302,1.75) A28(-7.938,1.75) A29(-8.572,1.75) A30(-9.207,1.75) B01(9.207,0.79) B02(8.572,0.79) B03(7.938,0.79) B04(7.302,0.79) B05(6.667,0.79) B06(6.032,0.79) B07(5.397,0.79) B08(4.763,0.79) B09(4.127,0.79) B10(3.492,0.79) B11(2.857,0.79) B12(2.222,0.79) B13(1.587,0.79) B14(0.952,0.79) B15(0.317,0.79) B16(-0.318,0.79) B17(-0.953,0.79) B18(-1.588,0.79) B19(-2.222,0.79) B20(-2.857,0.79) B21(-3.492,0.79) B22(-4.127,0.79) B23(-4.763,0.79) B24(-5.397,0.79) B25(-6.032,0.79) B26(-6.667,0.79) B27(-7.302,0.79) B28(-7.938,0.79) B29(-8.572,0.79) B30(-9.207,0.79) C01(9.207,-0.79) C02(8.572,-0.79) C03(7.938,-0.79) C04(7.302,-0.79) C05(6.667,-0.79) C06(6.032,-0.79) C07(5.397,-0.79) C08(4.763,-0.79) C09(4.127,-0.79) C10(3.492,-0.79) C11(2.857,-0.79) C12(2.222,-0.79) C13(1.588,-0.79) C14(0.953,-0.79) C15(0.318,-0.79) C16(-0.317,-0.79) C17(-0.952,-0.79) C18(-1.587,-0.79) C19(-2.222,-0.79) C20(-2.857,-0.79) C21(-3.492,-0.79) C22(-4.127,-0.79) C23(-4.763,-0.79) C24(-5.397,-0.79) C25(-6.032,-0.79) C26(-6.667,-0.79) C27(-7.302,-0.79) C28(-7.938,-0.79) C29(-8.572,-0.79) C30(-9.207,-0.79) D01(9.207,-1.75) D02(8.572,-1.75) D03(7.938,-1.75) D04(7.302,-1.75) D05(6.667,-1.75) D06(6.032,-1.75) D07(5.397,-1.75) D08(4.763,-1.75) D09(4.127,-1.75) D10(3.492,-1.75) D11(2.858,-1.75) D12(2.223,-1.75) D13(1.588,-1.75) D14(0.953,-1.75) D15(0.318,-1.75) D16(-0.317,-1.75) D17(-0.952,-1.75) D18(-1.587,-1.75) D19(-2.222,-1.75) D20(-2.857,-1.75) D21(-3.492,-1.75) D22(-4.127,-1.75) D23(-4.763,-1.75) D24(-5.397,-1.75) D25(-6.032,-1.75) D26(-6.667,-1.75) D27(-7.302,-1.75) D28(-7.938,-1.75) D29(-8.572,-1.75) D30(-9.207,-1.75)
  round 0 hole 0.95 unplated: ""(-10.61,1.27) ""(10.61,0)
  silkscreen extent -11.89,-2.5 11.89,2.82, body extent -11.89,-2.49 11.89,2.51, height 4.1
BL-R8812AF1 [mm]
  rect 2.2x1.1 smd: 1(-13.5,-5) 2(-13.5,-3) 3(-13.5,-1) 4(-13.5,1) 5(-13.5,3) 6(-13.5,5) 7(13.5,5.65) 8(13.5,4.15) 9(13.5,2.65) 10(13.5,-2.65) 11(13.5,-4.15) 12(13.5,-5.65)
  silkscreen extent -13.5,-8.9 13.5,8.9, body extent -13.5,-8.91 13.5,8.89, height 2.09
cap-0402 [mil]
  rect 18x25 smd mask+2.36: 1(-18.5,0) 2(18.5,0)
  silkscreen extent -31,-16 31,16, body extent -20,-10 20,10, height 19
Cap-0402 [mil]
  rect 18x25 smd mask+2.36: 1(-18.5,0) 2(18.5,0)
  silkscreen extent -31,-16 31,16, body extent -20,-10 20,10, height 19
Cap-0603 [mil]
  rect 30x35 smd mask+2.36: 1(-30,0) 2(30,0)
  silkscreen extent -49,-21 49,21, body extent -32,-16 31,16, height 34
Cap-0805 [mil] "SMD 0805"
  rect 40x60 smd mask+2.76: 1(-40,0) 2(40,0)
  silkscreen extent -64,-34 64,34, body extent -39,-25 39,25, height 30
Cap-1206 [mil] "SMD 1206"
  rect 60x70 smd: 1(-50,0) 2(50,0)
  silkscreen extent -84,-39 84,39, body extent -63,-31 63,32, height 39
Case-A [mm]
  rect 1.42x1.13 smd: 1(-1.2,0) 2(1.2,0)
  silkscreen extent -2.72,-0.97 1.63,0.97, body extent -1.6,-0.9 1.6,0.9, height 1.8
CSD17313Q2 [mm] "6-WSON (2x2)"
  rect 0.455x0.4 smd paste-1: 1(-0.923,0.65) 2(-0.923,0) 3(-0.923,-0.65) 4(0.923,-0.65) 5(0.923,0) 6(0.923,0.65)
  rect 0.85x0.4 smd paste-0.05: 7(0.096,-0.65)
  rect 1.1x1.05 smd paste-0.05: 8(0,0.325)
  silkscreen extent -1.45,-1.07 1,1.07, body extent -1,-1 1,1, height 0.8
DFN1006-2L_ [mm]
  rect 0.55x0.66 smd: 1(-0.425,0) 2(0.425,0)
  silkscreen extent -1.14,-0.51 0.81,0.51, body extent -0.5,-0.3 0.5,0.3, height 0.47
EVQ-P7J01P [mm]
  rect 1.4x1.05 smd: 1(-1.8,0.725) 1(1.8,0.725) 2(-1.8,-0.725) 2(1.8,-0.725)
  silkscreen extent -2.34,-1.47 2.31,1.5, body extent -2.35,-2.1 2.35,1.45, height 1.35
IND-0402 [mm]
  rect 0.4x0.6 smd: 1(-0.35,0) 2(0.35,0)
  silkscreen extent -0.71,-0.46 0.71,0.46, body extent -0.5,-0.25 0.5,0.25, height 0.25
LED-0603 [mm]
  rect 0.5x1 smd: 1(-0.75,0) 2(0.75,0)
  silkscreen extent -1.12,-0.66 1.75,0.66, body extent -0.82,-0.37 0.82,0.36, height 0.68
LPAV3-160-1000D-1-4 [mm]
  round 2.2 hole 1.8 unplated: MH1(-8.89,0) MH2(8.89,0)
  silkscreen extent -10.16,-2.54 10.16,2.54, body extent -10.15,-2.54 10.15,2.54, height 26.16
MCSJK-7U-12.00-10-10-80-B-10 [mm]
  rect 1.4x1.2 smd mask+0.07: 1(-1.1,-0.85) 2(1.1,-0.85) 3(1.1,0.85) 4(-1.1,0.85)
  silkscreen extent -2.06,-1.3 1.65,1.3, body extent -1.6,-1.25 1.6,1.25, height 0.91
MY-927-02 [mm]
  rect 3.5x4 smd paste+0 mask+0.051: 1(-6.45,0) 1(6.45,0)
  round 6 smd paste+0 mask+0.051: 2(0,0)
  silkscreen extent -5.99,-4.38 5.82,4.32, body extent -7.7,-4.28 7.7,4.48, height 3.15
"QFN-56 (7x7)" [mm]
  rect 0.875x0.2 smd: 1(-3.438,2.6) 2(-3.438,2.2) 3(-3.438,1.8) 4(-3.438,1.4) 5(-3.438,1) 6(-3.438,0.6) 7(-3.438,0.2) 8(-3.438,-0.2) 9(-3.438,-0.6) 10(-3.438,-1) 11(-3.438,-1.4) 12(-3.438,-1.8) 13(-3.438,-2.2) 14(-3.438,-2.6) 29(3.438,-2.6) 30(3.438,-2.2) 31(3.438,-1.8) 32(3.438,-1.4) 33(3.438,-1) 34(3.438,-0.6) 35(3.438,-0.2) 36(3.438,0.2) 37(3.438,0.6) 38(3.438,1) 39(3.438,1.4) 40(3.438,1.8) 41(3.438,2.2) 42(3.438,2.6)
  rect 0.2x0.875 smd: 15(-2.6,-3.438) 16(-2.2,-3.438) 17(-1.8,-3.438) 18(-1.4,-3.438) 19(-1,-3.438) 20(-0.6,-3.438) 21(-0.2,-3.438) 22(0.2,-3.438) 23(0.6,-3.438) 24(1,-3.438) 25(1.4,-3.438) 26(1.8,-3.438) 27(2.2,-3.438) 28(2.6,-3.438) 43(2.6,3.438) 44(2.2,3.438) 45(1.8,3.438) 46(1.4,3.438) 47(1,3.438) 48(0.6,3.438) 49(0.2,3.438) 50(-0.2,3.438) 51(-0.6,3.438) 52(-1,3.438) 53(-1.4,3.438) 54(-1.8,3.438) 55(-2.2,3.438) 56(-2.6,3.438)
  rect 3.2x3.2 smd: 57(0,0)
  silkscreen extent -4.22,-3.5 3.5,3.5, body extent -3.5,-3.5 3.5,3.5, height 0.9
QTH-030-01-L-D-A-K-TR [mm]
  rect 0.305x1.45 smd: 01(-7.25,3.086) 02(-7.25,-3.086) 03(-6.75,3.086) 04(-6.75,-3.086) 05(-6.25,3.086) 06(-6.25,-3.086) 07(-5.75,3.086) 08(-5.75,-3.086) 09(-5.25,3.086) 10(-5.25,-3.086) 11(-4.75,3.086) 12(-4.75,-3.086) 13(-4.25,3.086) 14(-4.25,-3.086) 15(-3.75,3.086) 16(-3.75,-3.086) 17(-3.25,3.086) 18(-3.25,-3.086) 19(-2.75,3.086) 20(-2.75,-3.086) 21(-2.25,3.086) 22(-2.25,-3.086) 23(-1.75,3.086) 24(-1.75,-3.086) 25(-1.25,3.086) 26(-1.25,-3.086) 27(-0.75,3.086) 28(-0.75,-3.086) 29(-0.25,3.086) 30(-0.25,-3.086) 31(0.25,3.086) 32(0.25,-3.086) 33(0.75,3.086) 34(0.75,-3.086) 35(1.25,3.086) 36(1.25,-3.086) 37(1.75,3.086) 38(1.75,-3.086) 39(2.25,3.086) 40(2.25,-3.086) 41(2.75,3.086) 42(2.75,-3.086) 43(3.25,3.086) 44(3.25,-3.086) 45(3.75,3.086) 46(3.75,-3.086) 47(4.25,3.086) 48(4.25,-3.086) 49(4.75,3.086) 50(4.75,-3.086) 51(5.25,3.086) 52(5.25,-3.086) 53(5.75,3.086) 54(5.75,-3.086) 55(6.25,3.086) 56(6.25,-3.086) 57(6.75,3.086) 58(6.75,-3.086) 59(7.25,3.086) 60(7.25,-3.086)
  rect 2.54x0.64 smd: G1(-8.445,0) G4(8.445,0)
  rect 4.7x0.64 smd: G2(-3.175,0) G3(3.175,0)
  round 0 hole 1.02 unplated: ""(-9.24,2.03) ""(9.24,2.03)
  silkscreen extent -10,-2.99 10,3.58, body extent -10,-3.56 10,3.56, height 4.37
Res-0402 [mil]
  rect 18x25 smd mask+2.17: 1(-18.5,0) 2(18.5,0)
  silkscreen extent -32,-17 32,16, body extent -23,-11 23,11, height 16
Res-0603 [mil]
  rect 30x35 smd: 1(-30,0) 2(30,0)
  silkscreen extent -48,-21 48,21, body extent -31,-17 31,17, height 18
RES-0805 [mil] "SMD 0805"
  rect 40x50 smd: 1(-40,0) 2(40,0)
  silkscreen extent -64,-29 64,29, body extent -39,-25 39,24, height 24
SM06B-GHS-TB(LF)(SN) [mm]
  rect 0.6x1.7 smd paste+0 mask+0.051: 1(-3.125,1.749) 2(-1.876,1.749) 3(-0.625,1.749) 4(0.625,1.749) 5(1.875,1.749) 6(3.124,1.749)
  rect 1x2.7 smd paste+0 mask+0.051: MP1(-4.975,-1.749) MP2(4.975,-1.749)
  silkscreen extent -5.5,-2.75 5.5,2.23, body extent -5.38,-2.68 5.37,2.18, height 4.26
SM08B-GHS-TB(LF)(SN) [mm]
  rect 0.6x1.7 smd paste+0 mask+0.05: 1(-4.375,1.6) 2(-3.125,1.6) 3(-1.875,1.6) 4(-0.625,1.6) 5(0.625,1.6) 6(1.875,1.6) 7(3.125,1.6) 8(4.375,1.6)
  rect 1.21x2.7 smd paste+0 mask+0.05: MP1(-6.225,-1.6) MP2(6.225,-1.6)
  silkscreen extent -6.65,-2.75 6.6,2.11, body extent -6.63,-2.7 6.63,2.15, height 4.35
SMD3225-4P [mm]
  rect 1.4x1.2 smd: 1(-1.1,-0.85) 2(1.1,-0.85) 3(1.1,0.85) 4(-1.1,0.85)
  silkscreen extent -2.08,-1.3 1.65,1.3, body extent -1.6,-1.25 1.6,1.25, height 0.81
SOD-323 [mm]
  rect 0.8x0.9 smd mask+0.055: 1(-1.15,0) 2(1.15,0)
  silkscreen extent -2.01,-0.79 0.94,0.79, body extent -1.3,-0.67 1.3,0.67, height 1.1
SOD-523 [mm] "SOD-523 Schottky Barrier Diodes (SBD) ROHS"
  rect 0.6x0.7 smd: 1(-0.6,0) 2(0.6,0)
  silkscreen extent -0.61,-0.53 1.42,0.53, body extent -0.8,-0.4 0.8,0.4, height 0.7
"SOIC-8(0.154\", 3.90mm Width)" [mm]
  rect 1.55x0.6 smd: 1(-2.7,1.905) 2(-2.7,0.635) 3(-2.7,-0.635) 4(-2.7,-1.905) 5(2.7,-1.905) 6(2.7,-0.635) 7(2.7,0.635) 8(2.7,1.905)
  silkscreen extent -3.79,-2.51 1.8,2.51, body extent -3.01,-2.45 3.01,2.45, height 1.63
SOT-23 [mm] "TRANS NPN 40V 0.6A SOT23"
  rect 0.82x0.92 smd: 1(-0.95,-1) 2(0.95,-1) 3(0,1)
  silkscreen extent -1.68,-1.3 1.55,0.81, body extent -1.5,-1.25 1.5,1.25, height 1.05
Sot-23 [mm] "TRANS NPN 40V 0.6A SOT23"
  rect 0.82x0.92 smd: 1(-0.95,-1) 2(0.95,-1) 3(0,1)
  silkscreen extent -1.68,-1.3 1.55,0.81, body extent -1.5,-1.25 1.5,1.25, height 1.05
SOT-23-5 [mm]
  rect 1.1x0.6 smd: 1(-1.3,0.95) 2(-1.3,0) 3(-1.3,-0.95) 4(1.3,-0.95) 5(1.3,0.95)
  silkscreen extent -2.13,-1.5 0.88,1.5, body extent -1.4,-1.45 1.4,1.45, height 1.45
"SOT-23-6 THIN" [mm]
  rect 1.12x0.62 smd: 1(-1.3,0.95) 2(-1.3,0) 3(-1.3,-0.95) 4(1.3,-0.95) 5(1.3,0) 6(1.3,0.95)
  silkscreen extent -2.13,-1.47 0.79,1.47, body extent -1.4,-1.45 1.4,1.45, height 1.44
Spacer [mm]
  round 6 hole 3.7: 1(0,0)
  body extent -2.55,-2.55 2.55,2.55, height 5.2
Test-point [mil]
  oct 60x60 smd: 1(0,0)
  silkscreen extent -37,-37 37,37
TL3340AF160QG [mm]
  rect 0.2x0.2 smd paste-1 mask+0: 1(-1.225,0.975) 1(-1.225,0.975) 3(1.225,0.975) 3(1.225,0.975)
  rect 0.6x1.8 smd: 2(0,0.975)
  rect 1.3x0.9 smd: S1(-1.85,-0.975) S2(1.85,-0.975)
  round 0 hole 0.9 unplated: ""(-2.125,0.075) ""(2.125,0.075)
  Top Layer region: -0.85,0.075 -1.525,0.075 -1.525,0.084 -1.525,0.102 -1.526,0.12 -1.529,0.138 -1.53,0.146 -1.53,0.146 -1.531,0.155 -1.533,0.173 -1.536,0.191 -1.54,0.209 -1.543,0.218 -1.545,0.228 -1.551,0.25 -1.557,0.271 -1.565,0.292 -1.569,0.302 -1.572,0.311 -1.579,0.327 -1.587,0.343 -1.595,0.358 -1.6,0.365 -1.6,0.375 -1.6,1.875 -0.85,1.875
  Top Layer region: 1.6,0.375 1.6,0.365 1.595,0.358 1.587,0.343 1.579,0.327 1.572,0.311 1.569,0.302 1.565,0.292 1.557,0.271 1.551,0.25 1.545,0.228 1.543,0.218 1.54,0.209 1.536,0.191 1.533,0.173 1.531,0.155 1.53,0.146 1.53,0.146 1.529,0.138 1.526,0.12 1.525,0.102 1.525,0.084 1.525,0.075 0.85,0.075 0.85,1.875 1.6,1.875
  Keep-Out Layer region: 1,-1.425 -1,-1.425 -1,-0.225 1,-0.225
  silkscreen extent -2.25,-1.97 2.25,1.8, body extent -2.21,-2.01 2.29,1.65, height 3.21
VLS3012HBX-3R3M [mm]
  rect 1x3.4 smd: 1(-1,0) 2(1,0)
  silkscreen extent -1.5,-1.85 1.47,1.85, body extent -1.51,-1.51 1.51,1.51, height 1.32
VSON-10-EP(3x3) [mm]
  rect 0.8x0.3 smd paste+0 mask+0.051: 1(-1.5,0.996) 2(-1.5,0.496) 3(-1.5,-0.004) 4(-1.5,-0.504) 5(-1.5,-1.004) 6(1.5,-0.996) 7(1.5,-0.496) 8(1.5,0.004) 9(1.5,0.504) 10(1.5,1.004)
  oval 0.912x2.052 smd: 11(0.002,-0.009)
  Top Layer region: -0.759,1.191 -0.374,1.191 -0.374,1.706 -0.124,1.706 -0.124,1.191 0.126,1.191 0.126,1.706 0.376,1.706 0.376,1.191 0.761,1.191 0.761,-1.209 0.376,-1.209 0.376,-1.714 0.126,-1.714 0.126,-1.209 -0.124,-1.209 -0.124,-1.714 -0.374,-1.714 -0.374,-1.209 -0.759,-1.209 -0.759,0.886 -0.759,0.886 -0.759,1.191
  silkscreen extent -2.21,-1.5 1.5,1.5, body extent -1.5,-1.5 1.5,1.5, height 1
"Wirepad 2.54/1.0" [mil]
  oct 100x100 hole 40: 1(0,0)
WQFN-30-EP(2.5x4.5) [mm]
  oval 0.3x0.12 smd: 1(-1.2,1.8) 10(-1.2,-1.8) 16(1.2,-1.8) 25(1.2,1.8)
  rect 0.505x0.2 smd paste-100 mask+0.051: 2(-1.2,1.4) 3(-1.2,1) 4(-1.2,0.6) 5(-1.2,0.2) 6(-1.2,-0.2) 7(-1.2,-0.6) 8(-1.2,-1) 9(-1.2,-1.4) 17(1.2,-1.4) 18(1.2,-1) 19(1.2,-0.6) 20(1.2,-0.2) 21(1.2,0.2) 22(1.2,0.6) 23(1.2,1) 24(1.2,1.4)
  oval 0.12x0.3 smd: 11(-0.8,-2.2) 15(0.8,-2.2) 26(0.8,2.2) 30(-0.8,2.2)
  rect 0.2x0.505 smd paste-100 mask+0.051: 12(-0.4,-2.2) 13(0,-2.2) 14(0.4,-2.2) 27(0.4,2.2) 28(0,2.2) 29(-0.4,2.2)
  rect 1.2x3.2 smd paste-100 mask+0.051: 31(0,0)
  Top Layer region: -0.9,-2.45 -0.7,-2.45 -0.7,-1.95 -0.7,-1.95 -0.8,-1.95 -0.9,-2.05 -0.9,-2.45
  Top Layer region: -1.45,-1.9 -1.45,-1.7 -0.95,-1.7 -0.95,-1.7 -0.95,-1.8 -1.05,-1.9 -1.45,-1.9
  Top Layer region: 1.45,1.9 1.45,1.7 0.95,1.7 0.95,1.7 0.95,1.8 1.05,1.9 1.45,1.9
  Top Layer region: 0.9,2.45 0.7,2.45 0.7,1.95 0.7,1.95 0.8,1.95 0.9,2.05 0.9,2.45
  Top Layer region: -0.9,2.45 -0.7,2.45 -0.7,1.95 -0.7,1.95 -0.8,1.95 -0.9,2.05 -0.9,2.45
  Top Layer region: -1.45,1.9 -1.45,1.7 -0.95,1.7 -0.95,1.7 -0.95,1.8 -1.05,1.9 -1.45,1.9
  Top Layer region: 1.45,-1.9 1.45,-1.7 0.95,-1.7 0.95,-1.7 0.95,-1.8 1.05,-1.9 1.45,-1.9
  Top Layer region: 0.9,-2.45 0.7,-2.45 0.7,-1.95 0.7,-1.95 0.8,-1.95 0.9,-2.05 0.9,-2.45
  silkscreen extent -1.71,-2.33 1.33,2.33, body extent -1.25,-2.25 1.25,2.25, height 0.8
XL-1010RGBC-WS2812B [mm]
  rect 0.45x0.45 smd: 1(-0.425,0.425) 2(0.425,0.425) 3(-0.425,-0.425) 4(0.425,-0.425)
  silkscreen extent -0.97,-0.74 1.17,0.74, body extent -0.5,-0.5 0.5,0.5, height 0.81
YSPI0520-2R2M_ [mm]
  rect 2x2.5 smd: 1(-2.5,0) 2(2.5,0)
  silkscreen extent -2.7,-2.6 2.7,2.6, body extent -2.7,-2.6 2.7,2.6, height 1.8

## Part data
C1 C57 C60 C65: library part CGA0805X5R476M100MT, "10V 47uF X5R ±20% 0805 Multilayer Ceramic Capacitors MLCC - SMD/SMT ROHS", LCSC Part Number=C6119904, Manufacturer=HRE, Package=0805, ComponentLink1Description=LCSC, ComponentLink1URL=https://www.lcsc.com/product-detail/Multilayer-Ceramic-Capacitors-MLCC-SMD-SMT_HRE-CGA0805X5R476M100MT_C6119904.html, Item Type=Capacitor, Manufacturer Part Number=CGA0805X5R476M100MT
C2 C3 C4 C13 C34 C56 C59 C61: library part GRM188R61E106KA73D, "CAP CER 10UF 25V X5R 0603", Case/Package=0603, LCSC Part Number=C344022, Manufacturer=Murata, Supplier Part Number 1=81-GRM188R61E106KA3D, Category="Ceramic Capacitors", ComponentLink1Description=https://search.murata.co.jp/Ceramy/image/img/A01X/G101/ENG/GRM188R61E106KA73-01.pdf?src-supplier=Digi-Key, ComponentLink1URL=https://search.murata.co.jp/Ceramy/image/img/A01X/G101/ENG/GRM188R61E106KA73-01.pdf?src-supplier=Digi-Key, Manufacturer Part Number=GRM188R61E106KA73D, Pricing 1="1=0.36000, 10=0.25800, 50=0.25800, 100=0.15500, 1000=0.09800, 10000=0.06900 (USD)", RoHS=Yes, RoHS Compliant=Yes, Stock 1=319428, Supplier 1=Mouser
C5 C10 C12 C14 C18 C19 C20 C21 C22 C23 C24 C25 C26 C33 C39 C40 C41 C42 C58 C62: library part C1005X7R1H104KT000F, "CAP CER 0.1UF 50V X7R 0402", Dielectric=X7R, LCSC Part Number=C361198, Manufacturer=TDK, Tolerance=10%, Voltage=25V, Category="Ceramic Capacitors", ComponentLink1Description=LCSC, ComponentLink1URL=https://www.lcsc.com/product-detail/Multilayer-Ceramic-Capacitors-MLCC-SMD-SMT_TDK-C1005X7R1H104KT000F_C361198.html, Item Type=Capacitor, Manufacturer Part Number=C1005X7R1H104KT000F, RoHS=No, Supplier 1=Avnet, Supplier Part Number 1=C1005X7R1H104KT000F
C6 C11: library part CC0402KRX5R8BB105, "CAP CER 1UF 25V X5R 0402", Case Code (Imperial)=0402, Case Code (Metric)=1005, Dielectric=X5R, LCSC Part Number=C326568, Manufacturer=Yageo, Max Operating Temperature=85°C, Min Operating Temperature=-55°C, Package Quantity=10000, Supplier Part Number 1=603-CC402KRX5R8BB105, Tolerance=10%, Voltage Rating=25V, Capacitance=1uF, Case/Package=0402, Category="Ceramic Capacitors", ComponentLink1Description=http://www.mouser.com/ds/2/447/Yageo_UPY-GP_NP0_16V-to-50V_9-358835.pdf?src-supplier=Mouser, ComponentLink1URL=http://www.mouser.com/ds/2/447/Yageo_UPY-GP_NP0_16V-to-50V_9-358835.pdf?src-supplier=Mouser, ComponentLink2Description=http://www.yageo.com/documents/recent/UPY-GPHC_X5R_4V-to-50V_25.pdf?src-supplier=Digi-Key, ComponentLink2URL=http://www.yageo.com/documents/recent/UPY-GPHC_X5R_4V-to-50V_25.pdf?src-supplier=Digi-Key, ComponentLink3Description=https://4donline.ihs.com/images/VipMasterIC/IC/YAGO/YAGO-S-A0006851646/YAGO-S-A0006851646-1.pdf?hkey=6D3A4C79FDBF58556ACFDE234799DDF0&src-supplier=Newark, ComponentLink3URL=https://4donline.ihs.com/images/VipMasterIC/IC/YAGO/YAGO-S-A0006851646/YAGO-S-A0006851646-1.pdf?hkey=6D3A4C79FDBF58556ACFDE234799DDF0&src-supplier=Newark, Halogen Free="Halogen Free", Lead Free="Lead Free", Length=0.039inch, Manufacturer Part Number=CC0402KRX5R8BB105, Mount="Surface Mount", Packaging="Tape and Reel", Pricing 1="1=0.30000, 10=0.20400, 50=0.20400, 100=0.11600, 1000=0.07200, 10000=0.05900 (USD)", RoHS=Yes, RoHS Compliant=Yes, Stock 1=91975, Supplier 1=Mouser, Termination=SMD/SMT, Thickness=0.022inch, Voltage Rating (DC)=25V, Weight=2.3E-05oz, Width=0.02inch
C7 C8 C9 C17 C37 C38: library part CL05A474KA5NNNC, "CAP CER 0.47UF 25V X5R 0402", Case Code (Imperial)=0402, Case Code (Metric)=1005, Manufacturer=Samsung, Max Operating Temperature=85°C, Min Operating Temperature=-55°C, Tolerance=10%, Voltage Rating=25V, Case/Package=0402, Category="Ceramic Capacitors", ComponentLink1Description=https://datasheet.ciiva.com/25796/cl05a474ka5nnnc-25796037.pdf?src-supplier=Digikey, ComponentLink1URL=https://datasheet.ciiva.com/25796/cl05a474ka5nnnc-25796037.pdf?src-supplier=Digikey, ComponentLink2Description=https://datasheet.ciiva.com/29198/458859-da-01-en-vs-kondensator-0402-29198303.pdf?src-supplier=Conrad, ComponentLink2URL=https://datasheet.ciiva.com/29198/458859-da-01-en-vs-kondensator-0402-29198303.pdf?src-supplier=Conrad, Height=550um, Lead Free="Lead Free", Manufacturer Part Number=CL05A474KA5NNNC, Material=Ceramic, Mounting Technology="Surface Mount", Packaging="Cut Tape", Pricing="100000=0.02563 (USD)", RoHS=Yes, RoHS Compliant=Yes, Series=CL, Stock=80000, Supplier=Avnet, Supplier Part Number=CL05A474KA5NNNC, Voltage Rating (DC)=25V
C15 C16 C67: library part GRM158R61A226ME15D, "CAP CER 22UF 10V X5R 0402", Case/Package=343Case, Dielectric=1537DielectricType, LCSC Part Number=C3845593, Manufacturer=Murata, Max Operating Temperature=85°C, Min Operating Temperature=-55°C, Supplier Part Number=81-GRM158R61A226ME5D, Tolerance=20%, Voltage Rating=10V, Category="Ceramic Capacitors", Height=800um, Item Type=Capacitor, Length=1mm, Manufacturer Part Number=GRM158R61A226ME15D, Material=4241ConductorMaterial, Pricing="1=0.46, 10=0.225, 50=0.225, 100=0.146, 1000=0.124, 10000=0.106 (USD)", RoHS=Yes, Stock=328944, Supplier=Mouser, Thickness=800um, Voltage Rating (DC)=10V, Width=500um
C27 C28: library part GRM1555C1H100JA01D, "CAP CER 10PF 50V C0G/NP0 0402", Case Code (Imperial)=0402, Case Code (Metric)=1005, Dielectric=C0G, LCSC Part Number=C76946, Manufacturer=Murata, Max Operating Temperature=125°C, Min Operating Temperature=-55°C, Package Quantity=1, Tolerance=5%, Voltage=50V, Case/Package=0402, Category="Ceramic Capacitors", ComponentLink1Description=https://datasheet.ciiva.com/2989/product-2989280.pdf?src-supplier=Avnet, ComponentLink1URL=https://datasheet.ciiva.com/2989/product-2989280.pdf?src-supplier=Avnet, ComponentLink2Description=https://datasheet.ciiva.com/18184/getdatasheetpartid-307234-18184164.pdf?src-supplier=Verical, ComponentLink2URL=https://datasheet.ciiva.com/18184/getdatasheetpartid-307234-18184164.pdf?src-supplier=Verical, ComponentLink3Description=https://datasheet.ciiva.com/29200/453545-da-01-en-vs-kondensator-0402-29200107.pdf?src-supplier=Conrad, ComponentLink3URL=https://datasheet.ciiva.com/29200/453545-da-01-en-vs-kondensator-0402-29200107.pdf?src-supplier=Conrad, ComponentLink4Description=https://datasheet.ciiva.com/7828/1666664-7828812.pdf?src-supplier=Element14, ComponentLink4URL=https://datasheet.ciiva.com/7828/1666664-7828812.pdf?src-supplier=Element14, ComponentLink5Description=https://datasheet.ciiva.com/6271/partnumbering-e-01-6271159.pdf?src-supplier=Digi-Key, ComponentLink5URL=https://datasheet.ciiva.com/6271/partnumbering-e-01-6271159.pdf?src-supplier=Digi-Key, ComponentLink6Description=https://datasheet.ciiva.com/6271/partnumbering-e-01-6271158.pdf?src-supplier=Digi-Key, ComponentLink6URL=https://datasheet.ciiva.com/6271/partnumbering-e-01-6271158.pdf?src-supplier=Digi-Key, ComponentLink7Description=https://datasheet.ciiva.com/6271/partnumbering-e-01-6271068.pdf?src-supplier=Digi-Key, ComponentLink7URL=https://datasheet.ciiva.com/6271/partnumbering-e-01-6271068.pdf?src-supplier=Digi-Key, Construction=Flat, Depth=0.5mm, Height=0.5mm, Item Type=Capacitor, Lead Free="Lead Free", Length=1mm, Manufacturer Part Number=GRM1555C1H100JA01D, Material=Ceramic, Mounting Technology="Surface Mount", Packaging="Tape and Reel", Pricing="10000=0.0034, 50000=0.0027, 100000=0.0023, 250000=0.0021 (USD)", Radiation Hardening=No, Reach SVHC Compliant=No, RoHS=Yes, RoHS Compliant=Yes, Series=GRM, Stock=3860000, Supplier="Arrow Electronics", Supplier Part Number=GRM1555C1H100JA01D, Termination=SMD/SMT, Thickness=0.022inch, Voltage Rating=50V, Voltage Rating (DC)=50V, Width=0.02inch
C29 C30 C31 C32: library part GRM155R61E225KE11D, "CAP CER 2.2UF 25V X5R 0402", Case Code (Imperial)=0402, Case Code (Metric)=1005, Dielectric=X5R, LCSC Part Number=C385032, Manufacturer=Murata, Max Operating Temperature=85°C, Min Operating Temperature=-55°C, Package Quantity=10000, Resistor Type=Ceramic, Tolerance=10%, Voltage Rating=25V, Capacitance=2.2uF, Case/Package=0402, Category="Ceramic Capacitors", ComponentLink1Description=http://www.mouser.com/ds/2/281/c02e-2905.pdf?src-supplier=Mouser, ComponentLink1URL=http://www.mouser.com/ds/2/281/c02e-2905.pdf?src-supplier=Mouser, ComponentLink2Description=http://search.murata.co.jp/Ceramy/image/img/A01X/G101/ENG/GRM155R61E225KE11-01.pdf?src-supplier=Digi-Key, ComponentLink2URL=http://search.murata.co.jp/Ceramy/image/img/A01X/G101/ENG/GRM155R61E225KE11-01.pdf?src-supplier=Digi-Key, ComponentLink3Description=http://search.murata.co.jp/Ceramy/image/img/A01X/partnumbering_e_01.pdf?src-supplier=Digi-Key, ComponentLink3URL=http://search.murata.co.jp/Ceramy/image/img/A01X/partnumbering_e_01.pdf?src-supplier=Digi-Key, ComponentLink4Description=http://psearch.en.murata.com/capacitor/product/GRM155R61E225KE11%23.pdf?src-supplier=Avnet, ComponentLink4URL=http://psearch.en.murata.com/capacitor/product/GRM155R61E225KE11%23.pdf?src-supplier=Avnet, Height=0.5mm, Item Type=Capacitor, Lead Free="Lead Free", Length=1mm, Manufacturer Part Number=GRM155R61E225KE11D, Material=Ceramic, Mount="Surface Mount", Packaging="Tape and Reel", Pricing 1="10000=0.03830, 20000=0.03623, 40000=0.03416, 60000=0.03209, 80000=0.03002, 100000=0.02795, 1000000=0.02588 (USD)", RoHS=Yes, RoHS Compliant=Yes, Stock 1=210000, Supplier 1=Avnet, Supplier Part Number 1=GRM155R61E225KE11D, Termination=SMD/SMT, Thickness=0.022inch, Voltage Rating (DC)=25V, Weight=0.000212oz, Width=0.5mm
C35: library part T55A107M6R3C0150, "CAP TANT POLY 100UF 6.3V 1206", LCSC Part Number=C2158718, Manufacturer="Vishay Sprague", Supplier Part Number=718-1988-1-ND, Category="Tantalum Capacitors", ComponentLink1Description=https://datasheet.ciiva.com/48510/t55-48510541.pdf?src-supplier=Avnet, ComponentLink1URL=https://datasheet.ciiva.com/48510/t55-48510541.pdf?src-supplier=Avnet, ComponentLink2Description=https://datasheet.ciiva.com/48510/t55-48510543.pdf?src-supplier=Avnet, ComponentLink2URL=https://datasheet.ciiva.com/48510/t55-48510543.pdf?src-supplier=Avnet, Item Type=Capacitor, Manufacturer Part Number=T55A107M6R3C0150, Pricing="1=0.79, 10=0.583, 50=0.4664, 100=0.3997, 500=0.31644, 1000=0.26648 (USD)", RoHS=Yes, Stock=2047, Supplier=Digi-Key
C36: library part GRM31CR61A107MEA8L, "CAP CER 100UF 10V X5R ±20% 1206 Multilayer Ceramic Capacitors MLCC - SMD/SMT ROHS", LCSC Part Number=C883598, Manufacturer="Murata Electronics", Package=1206, ComponentLink1Description=LCSC, ComponentLink1URL=https://www.lcsc.com/product-detail/Multilayer-Ceramic-Capacitors-MLCC-SMD-SMT_Murata-Electronics-GRM31CR61A107MEA8L_C883598.html, Item Type=Capacitor, Manufacturer Part Number=GRM31CR61A107MEA8L
C43 C44: library part GCM1555C1H180GA16D, "CAP CER 18PF 50V C0G/NP0 0402", Case Code (Imperial)=0402, Case Code (Metric)=1005, LCSC Part Number=C882583, Manufacturer=Murata, Max Operating Temperature=125°C, Min Operating Temperature=-55°C, Ratings=AEC-Q200, Supplier Part Number=2477793P, Tolerance=2%, Voltage Rating=50V, Case/Package=0402, Category="Ceramic Capacitors", ComponentLink1Description=http://search.murata.co.jp/Ceramy/image/img/A01X/G101/ENG/GCM1555C1H180GA16-01.pdf?src-supplier=Digi-Key, ComponentLink1URL=http://search.murata.co.jp/Ceramy/image/img/A01X/G101/ENG/GCM1555C1H180GA16-01.pdf?src-supplier=Digi-Key, ComponentLink2Description=https://search.murata.co.jp/Ceramy/image/img/A01X/G101/ENG/GCM1555C1H180GA16-01.pdf?src-supplier=Digi-Key, ComponentLink2URL=https://search.murata.co.jp/Ceramy/image/img/A01X/G101/ENG/GCM1555C1H180GA16-01.pdf?src-supplier=Digi-Key, ComponentLink3Description=https://datasheet.octopart.com/GCM1555C1H180GA16D-Murata-datasheet-149522315.pdf?src-supplier=Newark, ComponentLink3URL=https://datasheet.octopart.com/GCM1555C1H180GA16D-Murata-datasheet-149522315.pdf?src-supplier=Newark, ComponentLink4Description=https://datasheet.octopart.com/GCM1555C1H180GA16D-Murata-datasheet-12511495.pdf?src-supplier=TME, ComponentLink4URL=https://datasheet.octopart.com/GCM1555C1H180GA16D-Murata-datasheet-12511495.pdf?src-supplier=TME, Item Type=Capacitor, Manufacturer Part Number=GCM1555C1H180GA16D, Mounting Technology="Surface Mount", Packaging="Cut Tape", Pricing="500=0.013, 5000=0.009 (GBP)", RoHS=Yes, RoHS Compliant=Yes, Series=GCM, Stock=10000, Supplier=Rs
C45 C46 C47 C48 C49 C50 C51 C52 C53 C54 C55: library part CC0402KRX5R8BB103, "CAP CER 10000PF 25V X5R 0402", LCSC Part Number=C576726, Manufacturer=Yageo, Supplier Part Number 1=2101932, Category="Ceramic Capacitors", ComponentLink1Description=LCSC, ComponentLink1URL=https://www.lcsc.com/product-detail/Multilayer-Ceramic-Capacitors-MLCC-SMD-SMT_YAGEO-CC0402KRX5R8BB103_C576726.html, Item Type=Capacitor, Manufacturer Part Number=CC0402KRX5R8BB103, Pricing 1="10000=0.00290, 40000=0.00270, 150000=0.00260, 250000=0.00250, 500000=0.00240 (USD)", RoHS=Yes, RoHS Compliant=Yes, Stock 1=140000, Supplier 1="Future Electronics"
C63 C64: library part GRM158R61A226ME15D, "Surface Mount Ceramic Multilayer Capacitor 100pF 2% C0G 50V 0201 Paper T/R", Case/Package=343Case, Dielectric=1537DielectricType, LCSC Part Number=C3845593, Manufacturer=Murata, Max Operating Temperature=85°C, Min Operating Temperature=-55°C, Supplier Part Number=81-GRM158R61A226ME5D, Tolerance=20%, Voltage Rating=10V, Category="Ceramic Capacitors", Height=800um, Item Type=Capacitor, Length=1mm, Manufacturer Part Number=GRM158R61A226ME15D, Material=4241ConductorMaterial, Pricing="1=0.46, 10=0.225, 50=0.225, 100=0.146, 1000=0.124, 10000=0.106 (USD)", RoHS=Yes, Stock=328944, Supplier=Mouser, Thickness=800um, Voltage Rating (DC)=10V, Width=500um